# Altium PCB ESP32-C3FH4-v1.2.PcbDoc (part 1 of 2)
Units mil, origin at the board's own origin, x right, y up, seen from the top; angles counter-clockwise.
Board outline 1418.46 x 1854.93 mil, 4 copper layers (Top Layer, GND, POWER, Bottom Layer), stack 30.634 mil thick; 59 components, 45 nets, 255 pads, 118 vias.
Unrouted connection lines stored in the file: 2.
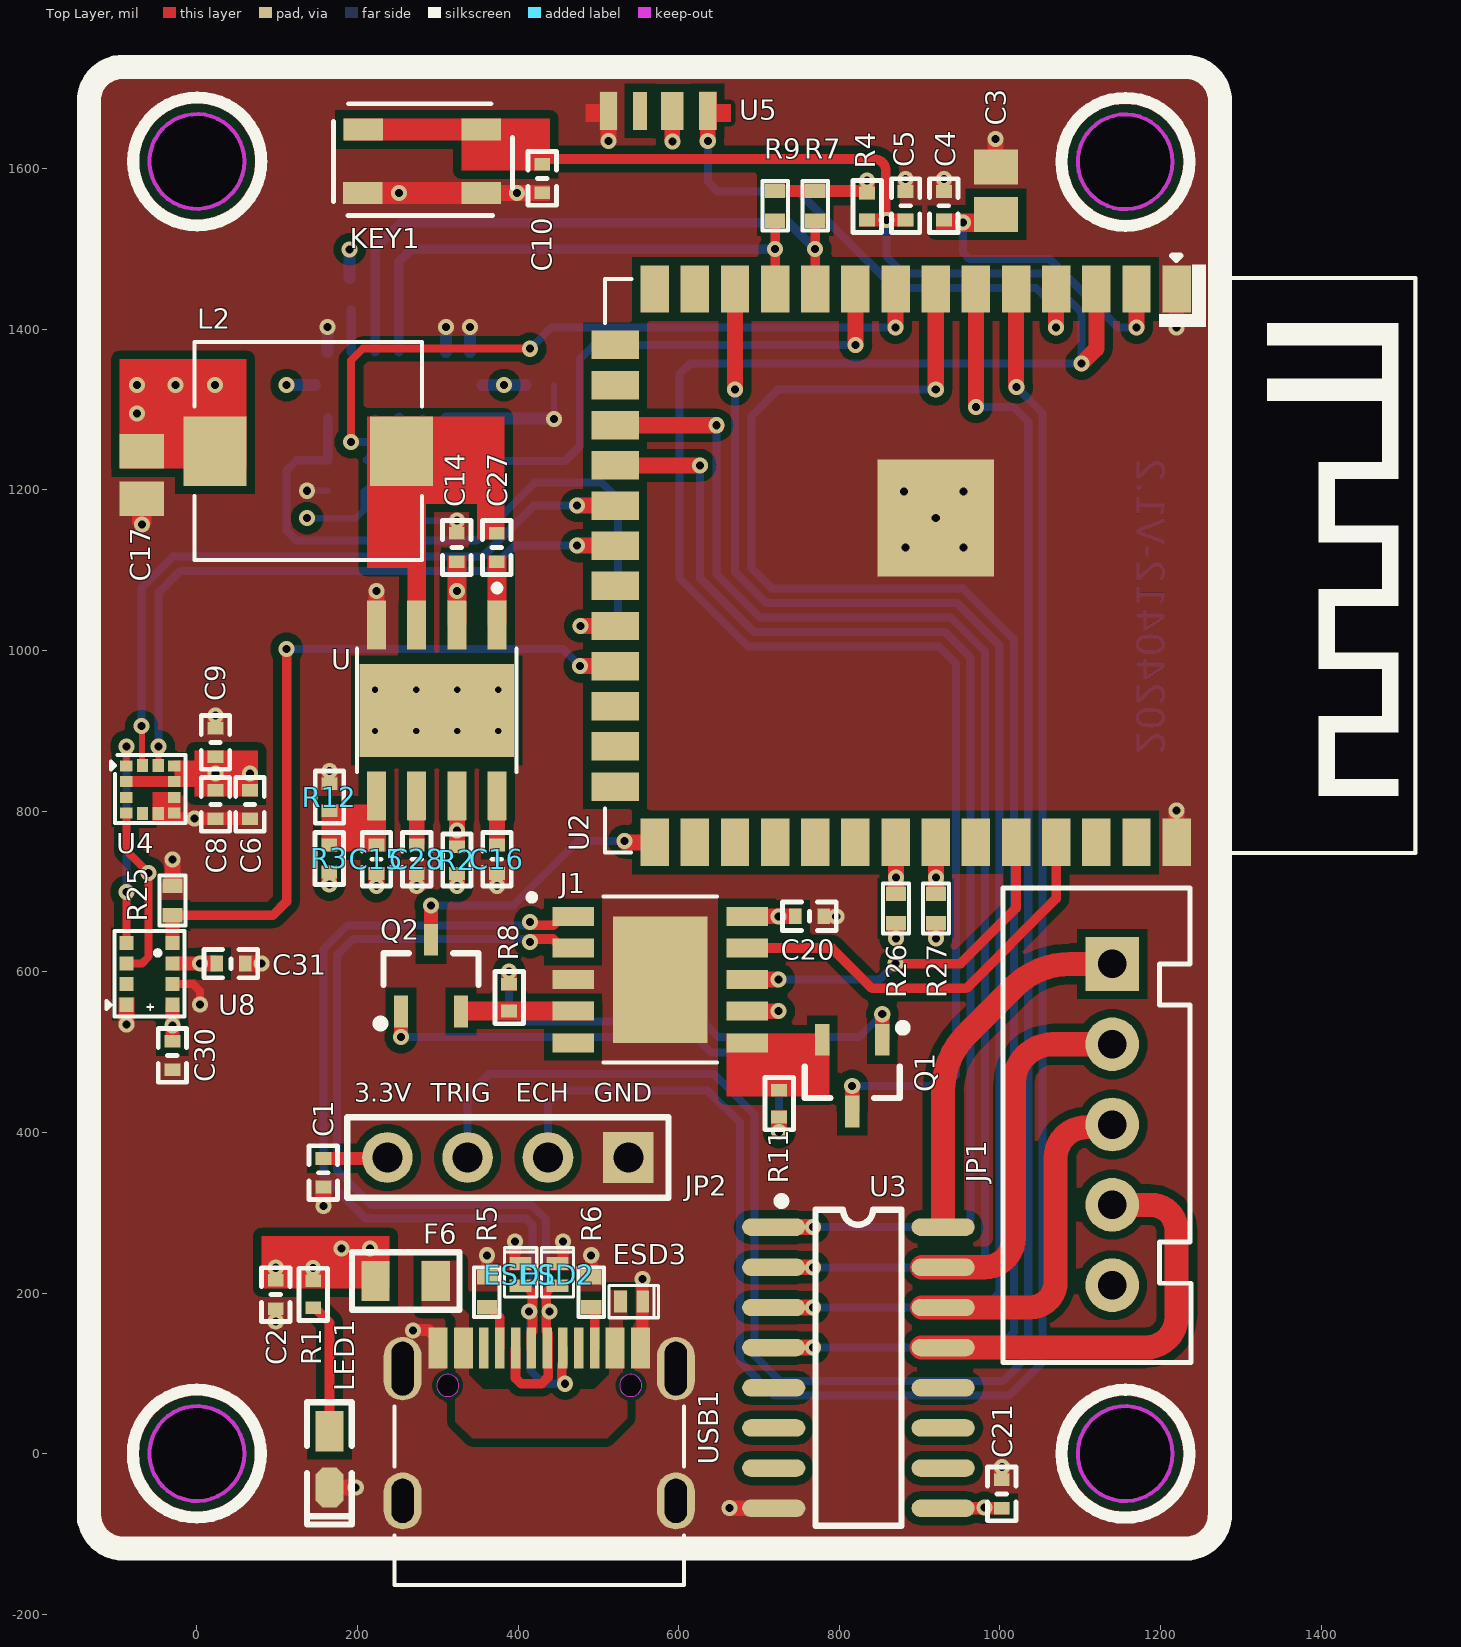
[diagram p0: Top Layer view]
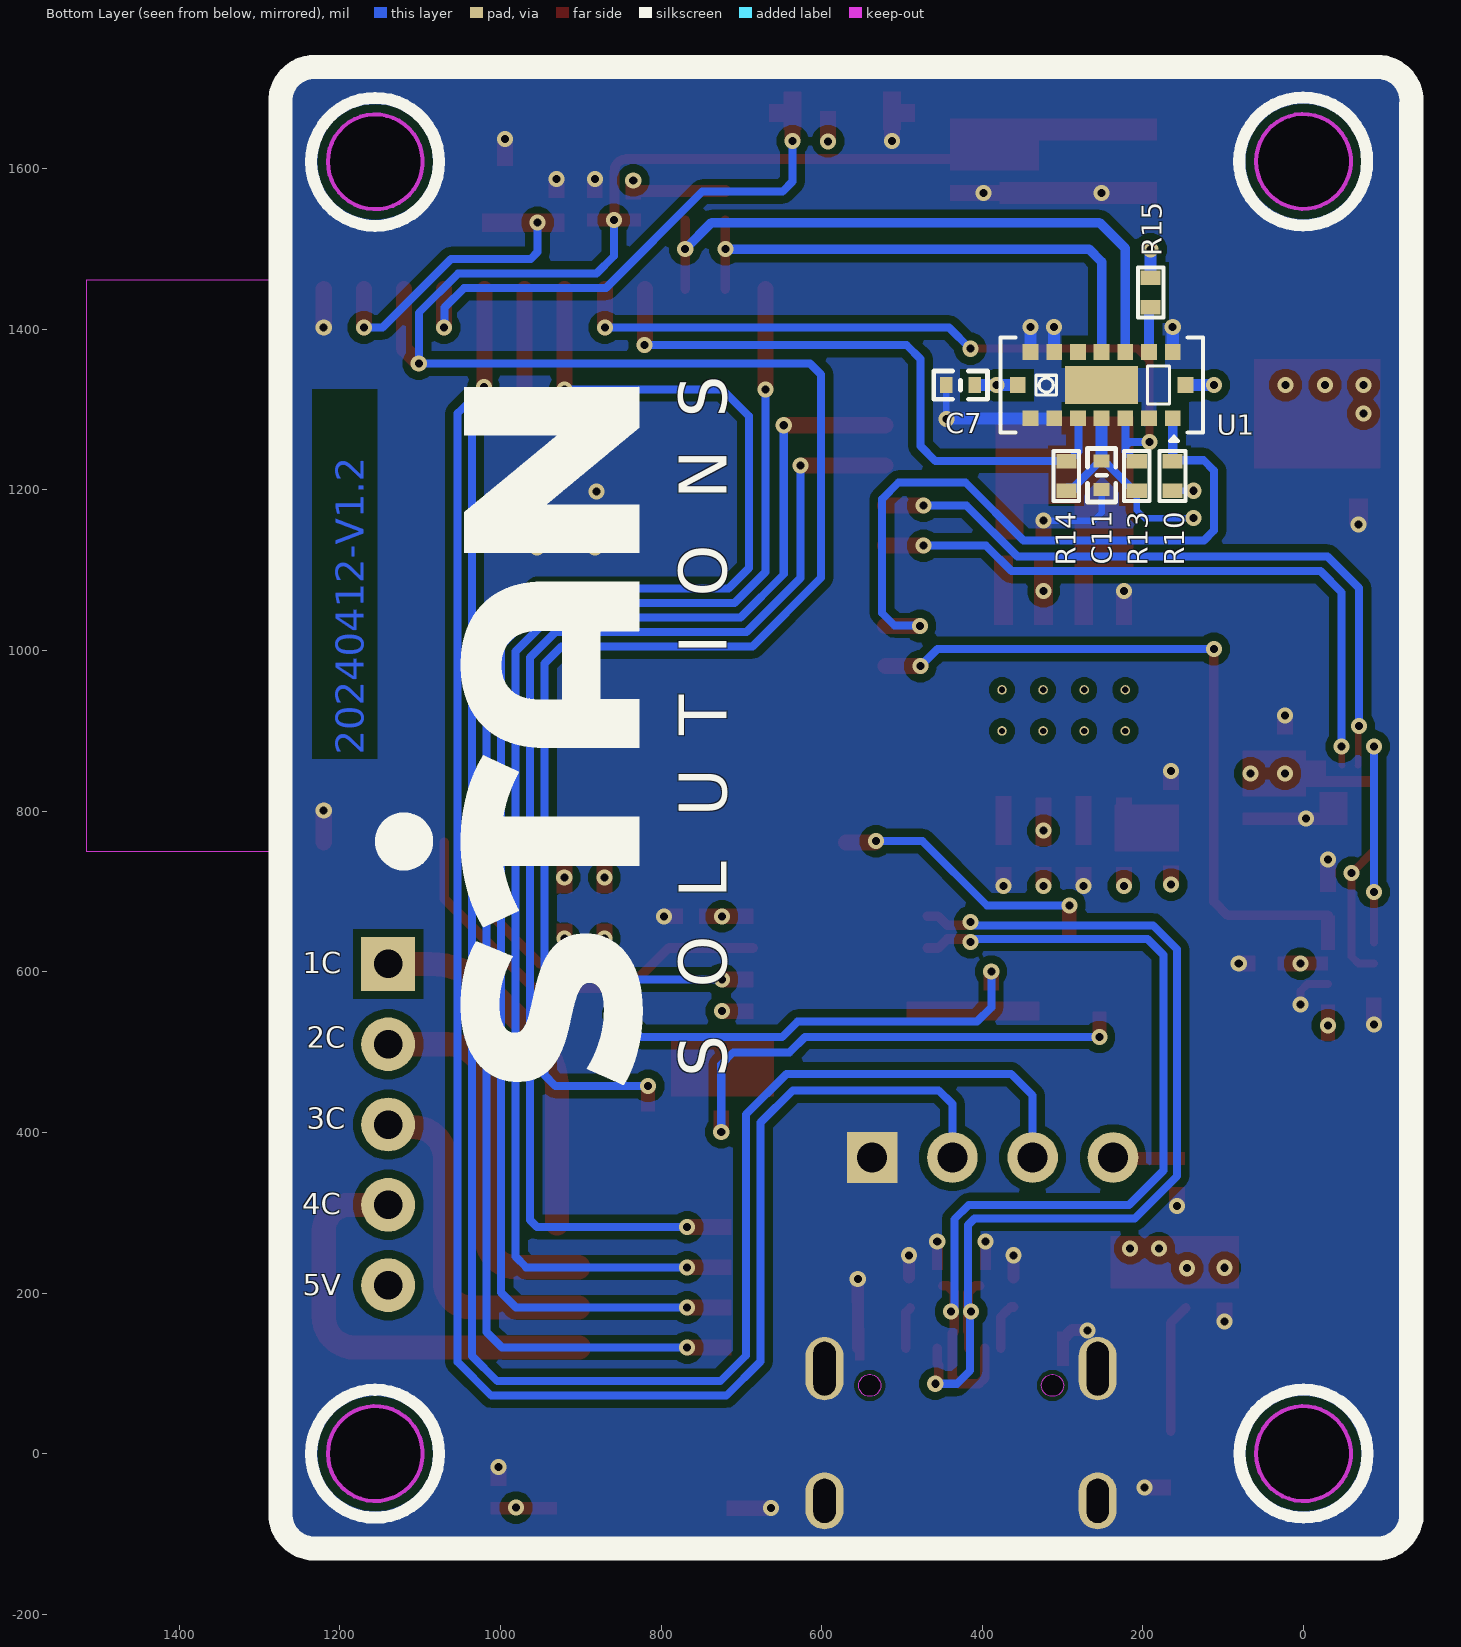
[diagram p1: Bottom Layer view, seen from below]
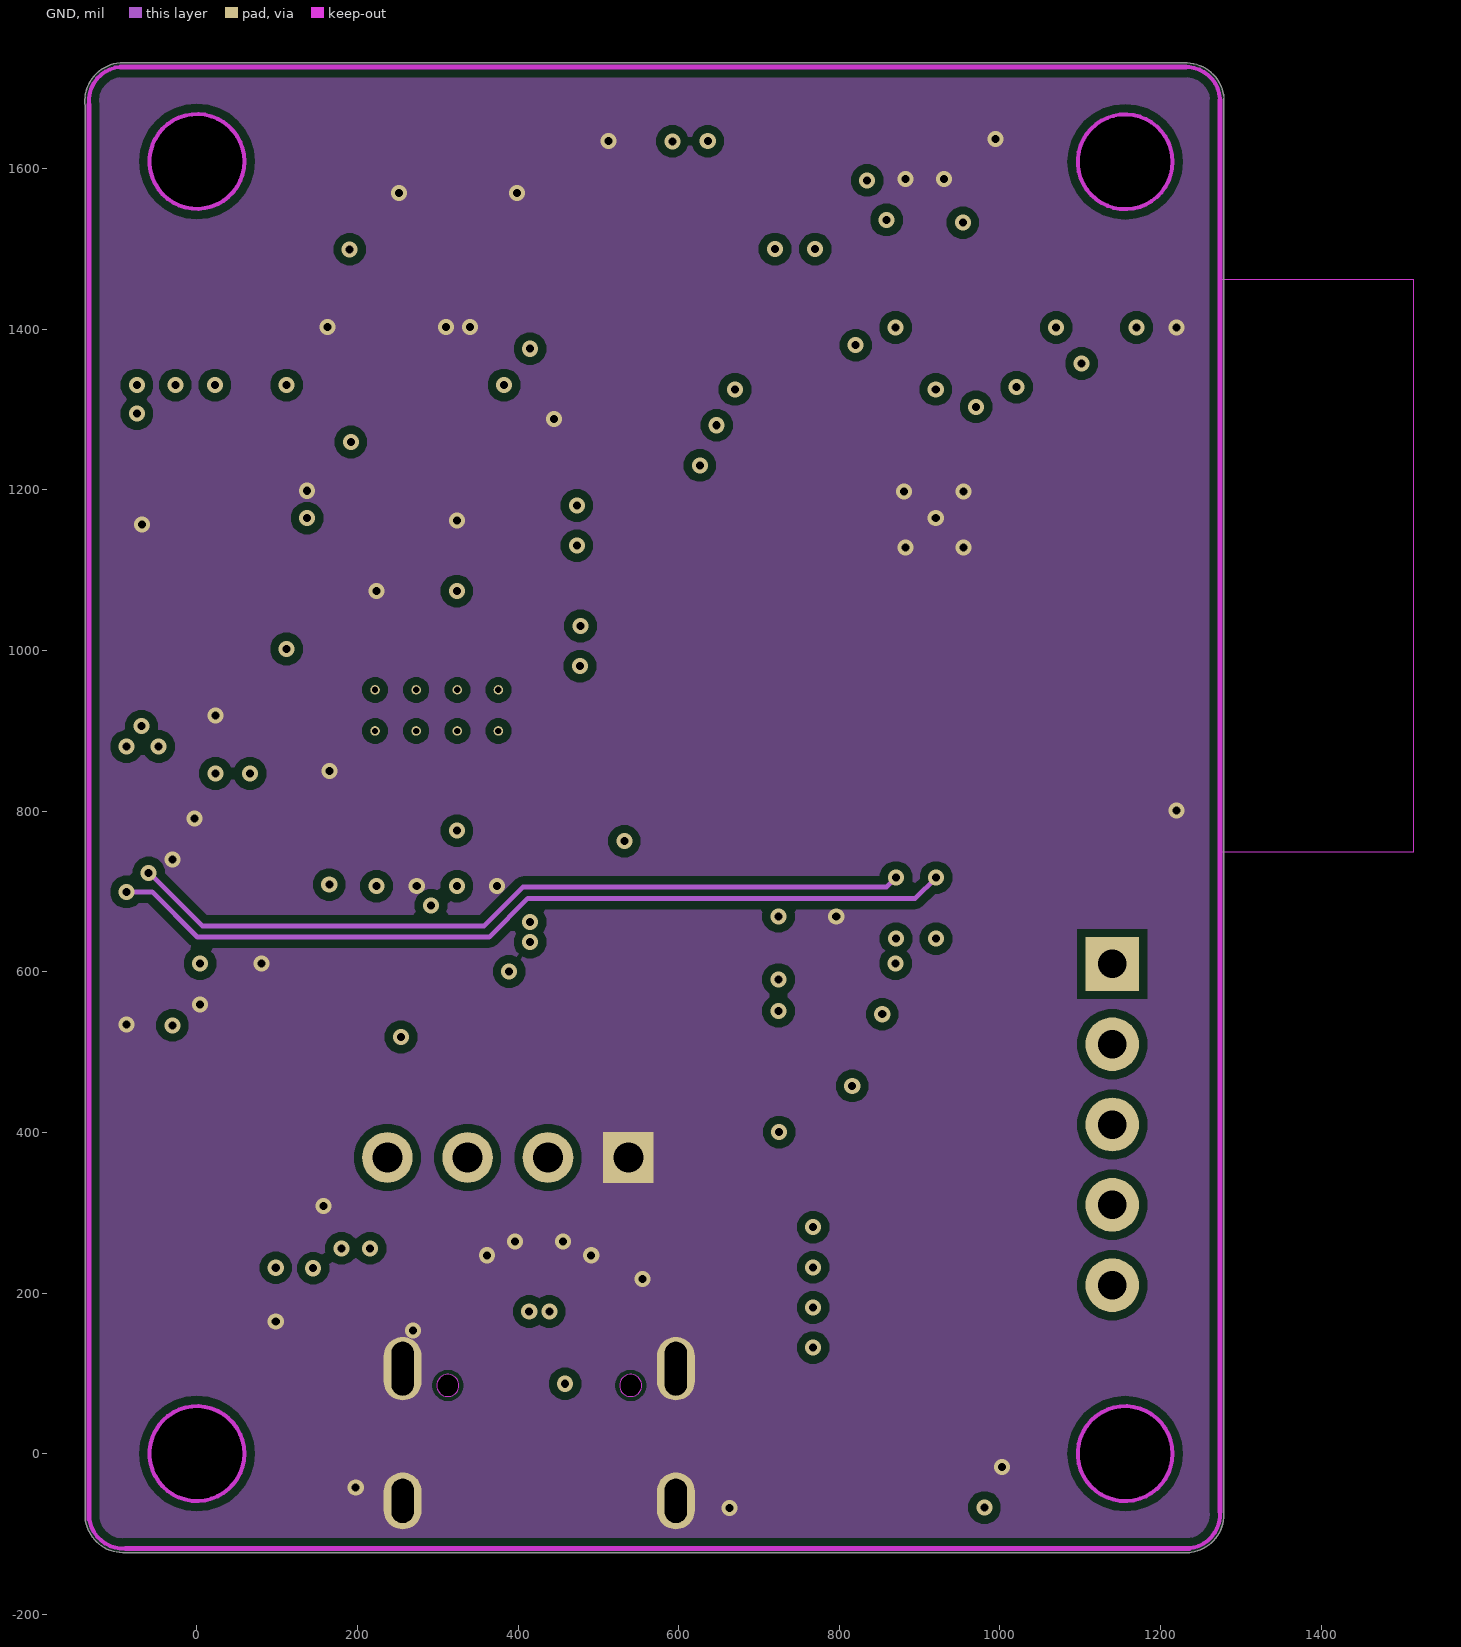
[diagram p2: GND]
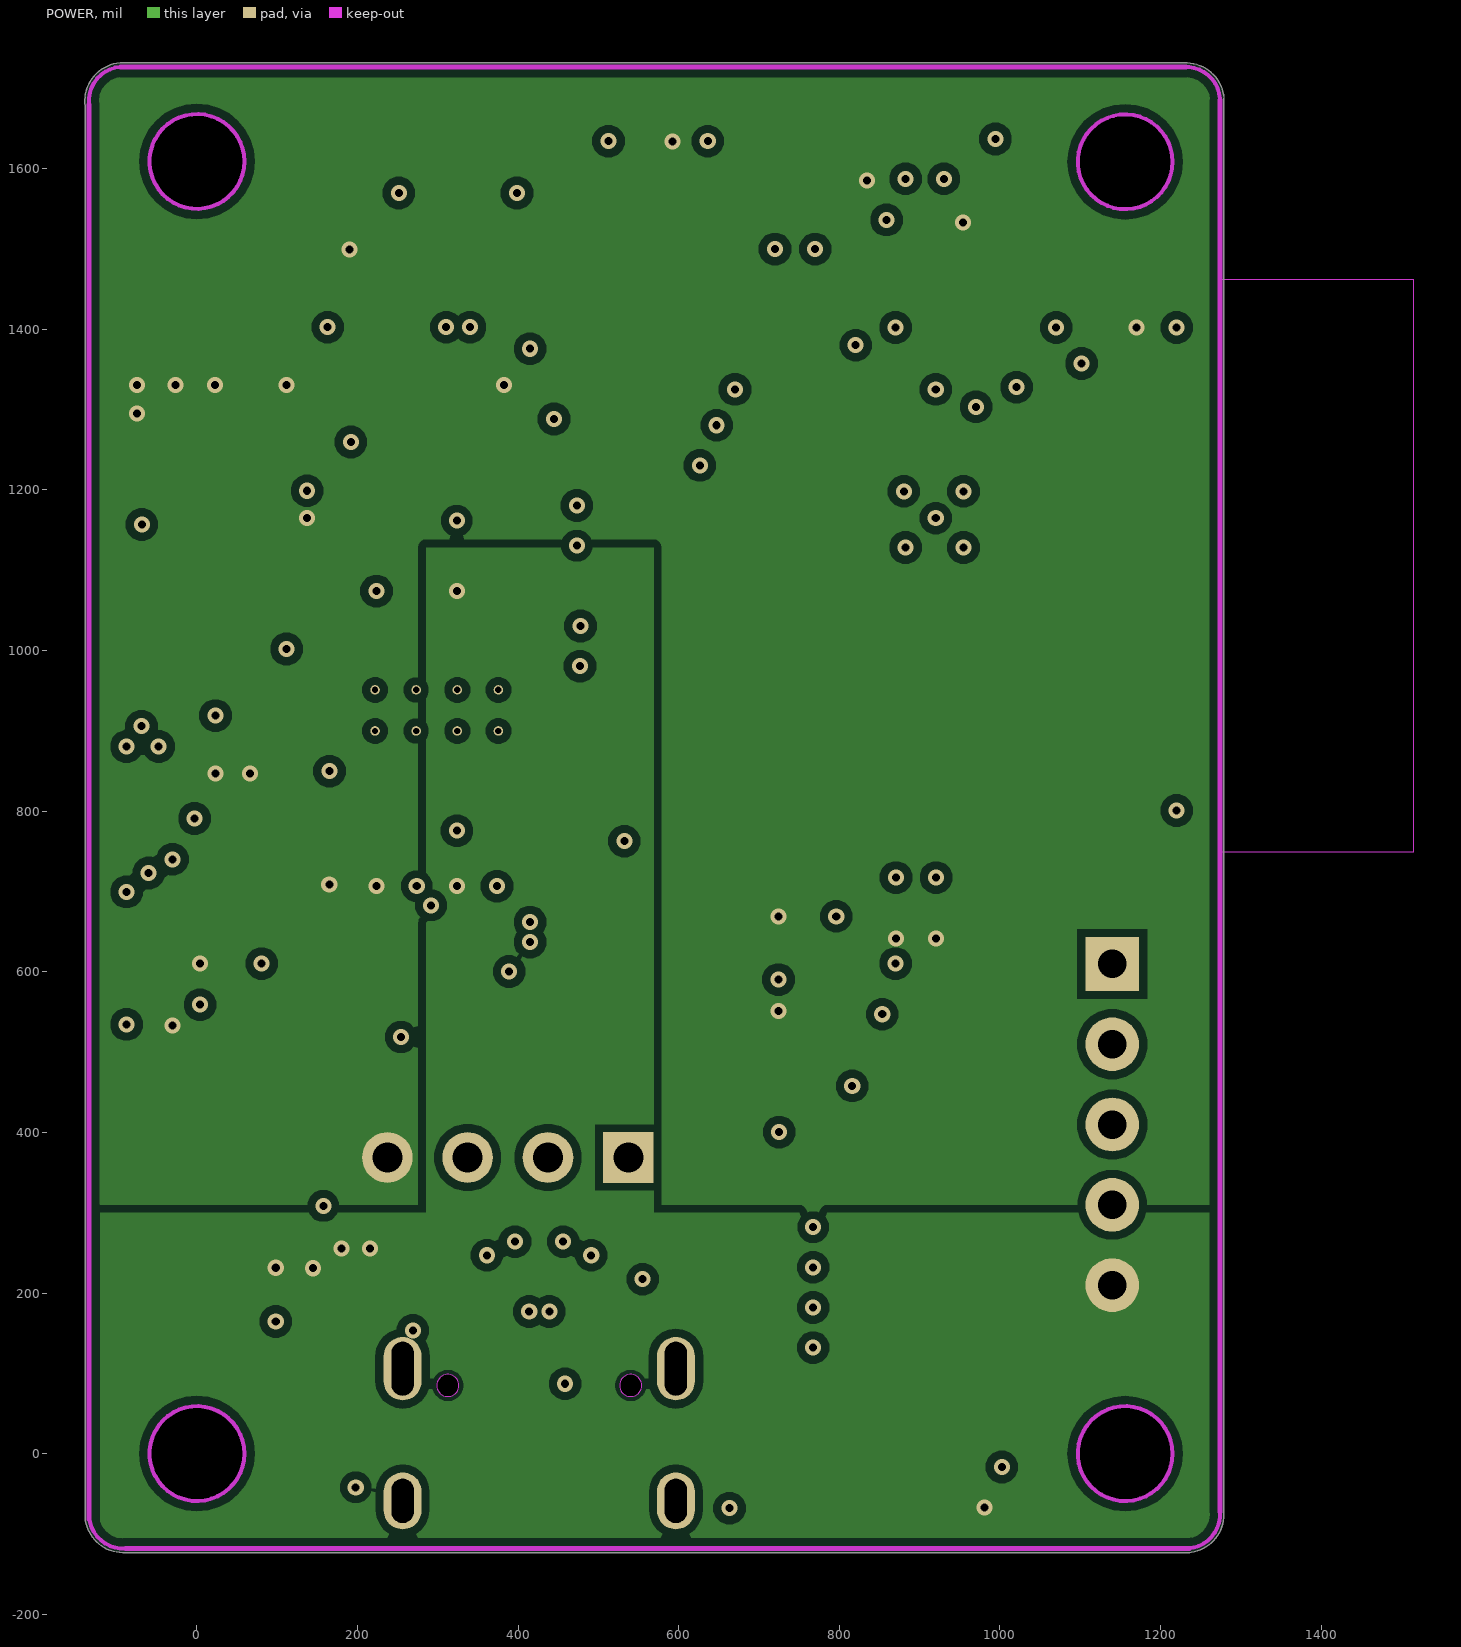
[diagram p3: POWER]
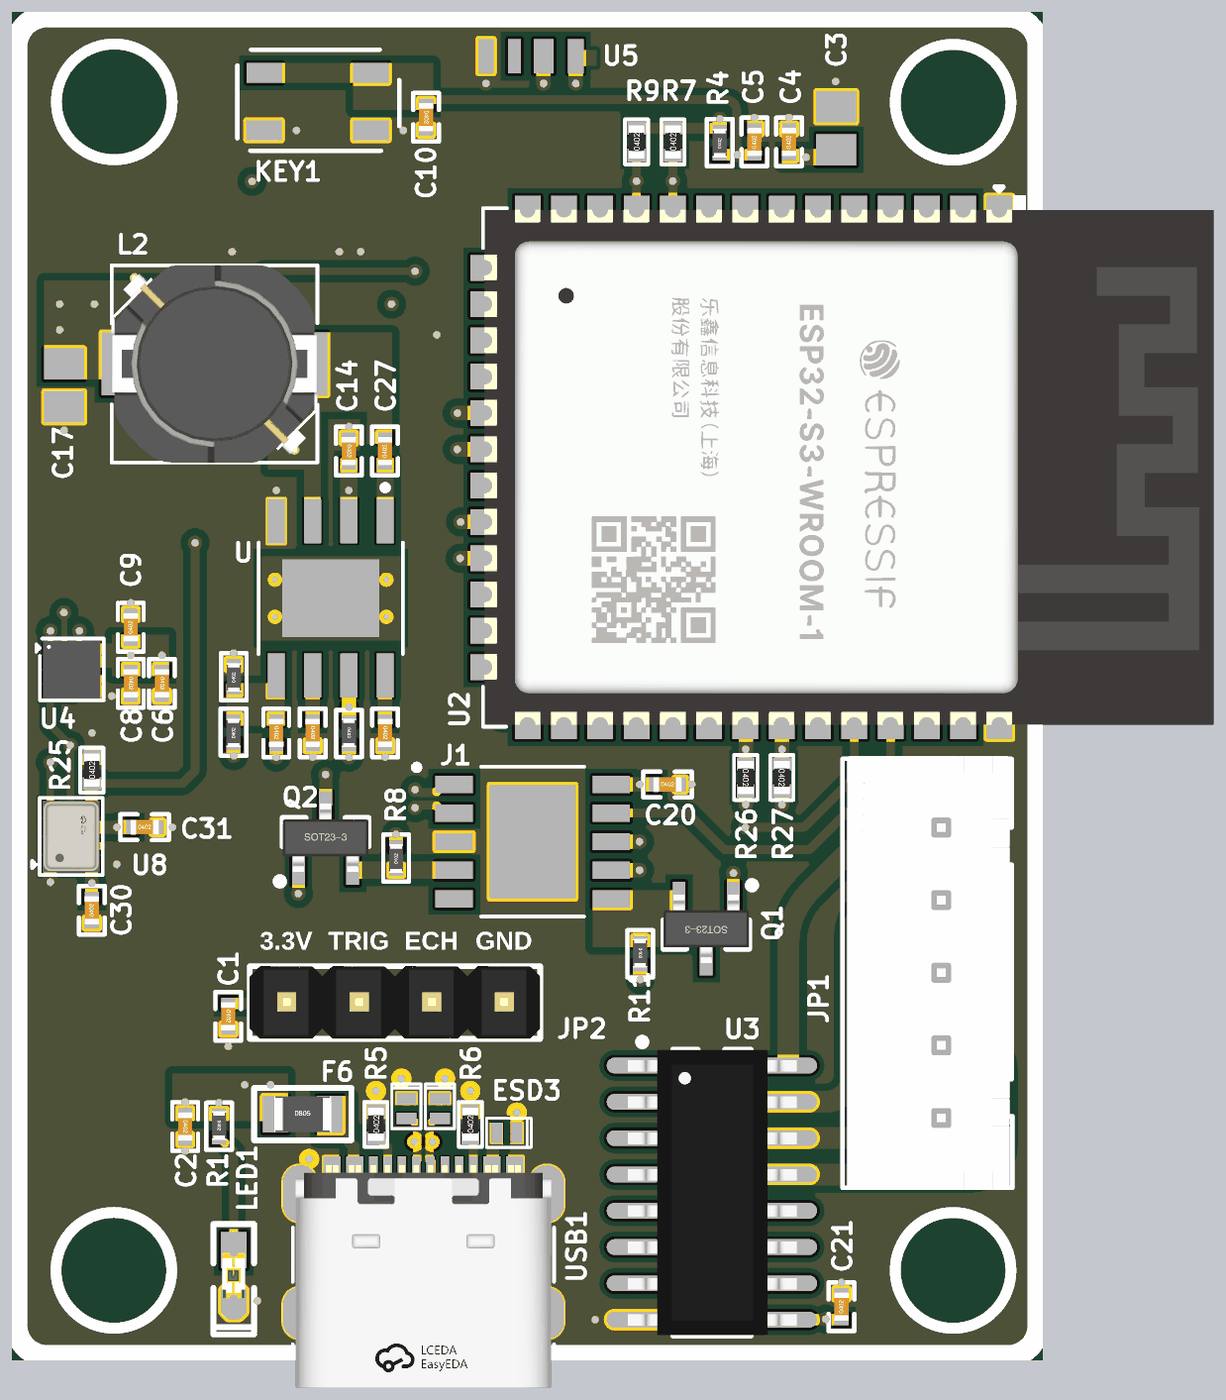
[diagram p4: 3D render of the assembled board from above, using the file's embedded part models]
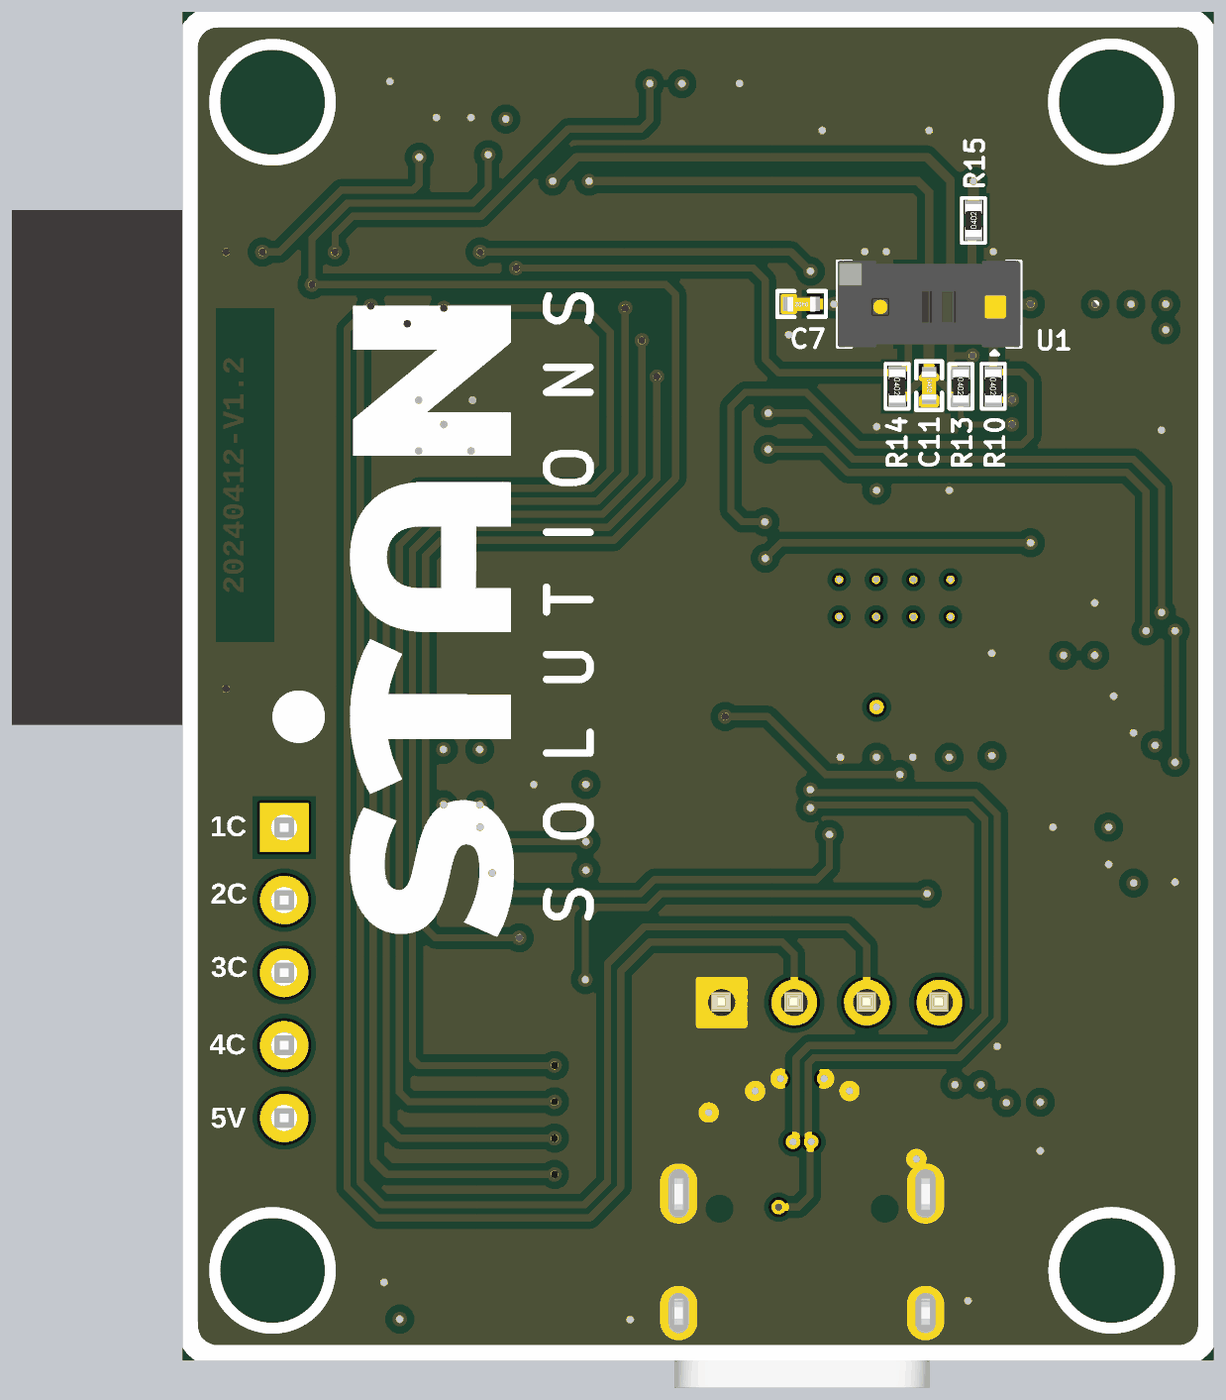
[diagram p5: 3D render of the assembled board from below, using the file's embedded part models]

## Layer stack, top to bottom
Top Solder: solder mask 0.4, Solder Resist, Dk 3.5
Top Layer: signal copper 1.4
Dielectric 1: core 10, FR-4, Dk 4.2
GND: signal copper 1.417
Dielectric 3: prepreg 5, Dk 4.2
POWER: signal copper 1.417
Dielectric 2: core 10, Dk 4.2
Bottom Layer: signal copper 1.4
Bottom Solder: solder mask 0.4, Solder Resist, Dk 3.5

## Board outline
-139.23,-83.02 -139.23,1679.18 -139.51,1681.13 cw(c-92.21,1684.49) -95.57,1731.79 -94.81,1731.79 1231.89,1731.79 1232.83,1731.7 cw(c1231.64,1684.29) 1278.94,1687.65 1278.86,1685.57 1278.86,-72.82 1278.86,-75.82 cw(c1231.44,-75.82) 1238.05,-122.78 1236.19,-123.14 -88.48,-123.14 -88.56,-123.14 cw(c-91.91,-75.84)
cut-out: 1156.2,1549.61 cw(c1156.2,1608.66) 1097.14,1608.66 cw(c1156.2,1608.66) 1156.2,1667.72 cw(c1156.2,1608.66) 1215.26,1608.66 cw(c1156.2,1608.66)
cut-out: 1156.2,-59.09 cw(c1156.2,-0.03) 1097.14,-0.03 cw(c1156.2,-0.03) 1156.2,59.02 cw(c1156.2,-0.03) 1215.26,-0.03 cw(c1156.2,-0.03)
cut-out: 0.5,1550.12 cw(c0.5,1609.17) -58.56,1609.17 cw(c0.5,1609.17) 0.5,1668.23 cw(c0.5,1609.17) 59.56,1609.17 cw(c0.5,1609.17)
cut-out: -59.06,0 ccw(c0,0) 0,-59.06 ccw(c0,0) 59.06,0 ccw(c0,0) 0,59.06 ccw(c0,0)

## Design rules (kind name [scope] priority, off if disabled: settings)
Clearance [All] p1: gap=5 ignorepadtopadclearanceinfootprint=FALSE except(10: Arc-Poly Track-Poly SMDPad-Poly THPad-Poly Via-Poly Fill-Poly Poly-Poly)
ComponentClearance [All] p1: gap=10 collisioncheckmode=3 verticalgap=10 showdistances=TRUE
DiffPairsRouting DiffPairsRouting_2 [All] p1: maxlimit=5 minlimit=5 mostfreqgap=5 toplayer_minwidth=12 toplayer_maxwidth=12 toplayer_prefwidth=12 bottomlayer_minwidth=12 bottomlayer_maxwidth=12 bottomlayer_prefwidth=12 impedanceprofiledriven=TRUE impedanceprofileid={24D7325C-6BC3-4DBD-915D-B261285324E1} impedanceprofilevalue=90.000000 maxuncoupledlength=500
HoleToHoleClearance [All] p1: gap=0 allowstackedmicrovias=TRUE
MatchedLengths USB [InNetClass('USB')] p1: tolerance=20 checknetsindiffpair=TRUE checkdiffpairvsdiffpair=FALSE checkxsignals=FALSE checkothers=FALSE
MinimumSolderMaskSliver [All] p1: minsoldermaskwidth=0
PlaneClearance [All] p1: clearance=10
PlaneConnect [All] p1: planeconnectstyle=Direct reliefexpansion=20 reliefentries=4 reliefconductorwidth=10 reliefairgap=10
PolygonConnect [All] p1: connectstyle=Direct reliefconductorwidth=10 reliefentries=4 polygonreliefangle="90 Angle" airgapwidth=10
RoutingVias [All] p1: holewidth=10 width=20 viastyle="Through Hole" minholewidth=10 minwidth=20 maxholewidth=10 maxwidth=20
SilkToSilkClearance [All] p1: silktosilkclearance=0
SilkToSolderMaskClearance [IsPad] p1: minsilkscreentomaskgap=0 clearancetoexposedcopper=TRUE
SolderMaskExpansion [All] p1: expansion=4 istentingtop=FALSE
SupplyNets "Schematic Supply Nets_2" [InNet('3.3V')] p1: voltage=0.000
SupplyNets "Schematic Supply Nets_1" [InNet('GND')] p2: voltage=0.000
SupplyNets "Schematic Supply Nets" [InNet('VIN5V')] p3: voltage=0.000
ViasUnderSMD [All] p1: allowed=FALSE
Width power [InNetClass('power')] p1: maxlimit=100 minlimit=12 preferedwidth=12
Width [All] p2: maxlimit=100 minlimit=5 preferedwidth=8 midlayer1_prefwidth=6 midlayer2_prefwidth=6 minimp=50.000000 maximp=50.000000 favimp=50.000000
22 further rules are at their usual default settings.

## Classes and differential pairs
differential pair class USB_Lines: D
net class USB: D_N D_P
differential pair D: +D_P -D_N

## Components (designator, comment, footprint, x,y, rotation, side; value= is the part's Value field where it differs from the comment)
C1 "0.1uF/25V" "C 0402_L" 157.43,349.82 r270 top
C2 "0.1uF/25V" "C 0402_L" 98.15,198.02 r270 top
C3 "22uF/25V" C0805 995.13,1572.68 r90 top
C4 "0.1uF/25V" "C 0402_L" 930.13,1553.96 r90 top
C5 "1uF/10V" "C 0402_L" 882.44,1553.96 r90 top
C6 "0.1uF/25V" "C 0402_L" 66.08,808.41 r270 top
C7 "22uF" "C 0402_L" 426.96,1330.6 r0 bottom
C8 "10uF/10V" "C 0402_L" 23.11,808.41 r270 top
C9 "0.1uF/25V" "C 0402_L" 23.1,885.59 r90 top
C10 "0.1uF/25V" "C 0402_L" 430,1588 r270 top
C11 "0.1uF" "C 0402_L" 251.37,1218.29 r270 bottom
C14 "22uF/10V" "C 0402_L" 323.6,1128.31 r270 top value=15P
C15 "10pF/10V" "C 0402_L" 223.6,740.1 r270 top value=15P
C16 "8.2nF/25V" "C 0402_L" 373.6,740.1 r270 top
C17 "22uF/25V" C0805 -68.66,1218.69 r270 top
C20 "0.1uF/25V" "C 0402_L" 762.64,669.06 r0 top
C21 "0.1uF/25V" "C 0402_L" 1002.28,-50.13 r90 top
C27 "0.1uF/10V" "C 0402_L" 373.34,1128.31 r90 top value=15P
C28 "1uF/25V" "C 0402_L" 273.74,740.1 r270 top
C30 "0.1uF/25V" "C 0402_L" -30.52,495.88 r90 top
C31 "0.1uF/25V" "C 0402_L" 42.26,610.23 r0 top
ESD1 "ESD5311N-2/TR" X1-DFN1006-2_L1.0-W0.6-RD 403,223 r270 top
ESD2 "ESD5311N-2/TR" X1-DFN1006-2_L1.0-W0.6-RD 449,223 r270 top
ESD3 "ESD5311N-2/TR" X1-DFN1006-2_L1.0-W0.6-RD 541.21,189.38 r180 top
F6 "6V1A" "R 0805_L" 260,215 r0 top
J1 "CH340K" *SOP100P600X160-11N 576.85,590.32 r0 top locked
JP1 "HDR-1X5" XH2.54-LI-5P 1139.81,409.8 r270 top
JP2 "X6511WV-04H-C60D30" HDR1X4_ 537.13,368.74 r180 top
KEY1 "6*6*5" "TSW SMD-6*6*5" 380,1658.94 r180 top
L2 "CLF7045T-3R3N-D" IND_CLF7045T-3R3N-D 138.52,1248.31 r0 top locked value=0R1%
LED1 "GREEN" "LED 0603B" 164.79,-7.22 r270 top locked
Q1 "S8050" SOT23-3L 816,470.29 r180 top
Q2 "S8050" SOT23-3L 291.47,595.62 r0 top
R1 "1K" "R 0402_L" 144.8,199.36 r270 top locked
R2 "10K" "R 0402_L" 323.76,740.1 r270 top
R3 "84.5K" "R 0402_L" 164.79,740.1 r90 top
R4 "10K" "R 0402_L" 834.56,1552 r90 top
R5 "5.1K" Res-0402 361,201 r90 top locked
R6 "5.1K" Res-0402 491,201 r90 top locked
R7 "2.2K" Res-0402 770,1553.96 r90 top
R8 "10K" "R 0402_L" 388.75,566.88 r90 top
R9 "2.2K" Res-0402 720,1553.96 r90 top
R10 "47K" Res-0402 163,1217.5 r270 bottom
R11 "10K" "R 0402_L" 725,436.84 r270 top
R12 "25.5K" "R 0402_L" 165.05,816.41 r90 top
R13 "47K" Res-0402 207.6,1217.5 r270 bottom
R14 "47K" Res-0402 295.25,1217.5 r270 bottom
R15 "47K" Res-0402 190.24,1445.75 r90 bottom
R25 "100K" Res-0402 -30.52,688.81 r90 top
R26 "2.2K" Res-0402 870.46,678.7 r270 top
R27 "2.2K" Res-0402 920.29,678.7 r270 top
U "TPS54339DDA" VREG_LM5017MR/NOPB 298.6,925.5 r270 top locked
U1 "VL53L5CXV0GC/1" VL53L5CXV0GC/1 251.36,1330.59 r180 bottom
U2 "ESP32-S3-WROOM-1-N4R2" "41-SMD Module" 870.39,1105.79 r270 top locked
U3 "ULN2003" SOP16 823.27,107.03 r0 top locked
U4 "LIS2DW12TR" "12-LGA (2x2)" -58,827 r0 top
U5 "SK6812 SIDE-A" "SK6812 SIDE-A" 741.11,1705.63 r180 top locked
U8 "SPL06-001" SPL06-001 -59.06,597.44 r180 top
USB1 "KH-TYPE-C-16P" KH-TYPE-C-16P 426.29,36.28 r0 top locked

## Footprints (in the part's own frame and the unit in brackets; to place one, negate y for a bottom-side part, rotate by r counter-clockwise, add the part's x,y. Pads: shape width x height; smd on the part's side, far side on the other; paste and mask are expansions set on the pad)
"12-LGA (2x2)" [mm]
  rect 0.4x0.35 smd: 1(-0.76,0.75) 2(-0.76,0.25) 3(-0.76,-0.25) 4(-0.76,-0.75) 7(0.76,-0.75) 8(0.76,-0.25) 9(0.76,0.25) 10(0.76,0.75)
  rect 0.35x0.4 smd: 5(-0.25,-0.76) 6(0.25,-0.76) 11(0.25,0.76) 12(-0.25,0.76)
  silkscreen extent -1.24,-1.07 1.12,1.09, body extent -1,-1 1,1, height 0.7
"41-SMD Module" [mm]
  rect 1.5x0.9 smd: 1(-8.75,8.88) 2(-8.75,7.61) 3(-8.75,6.34) 4(-8.75,5.07) 5(-8.75,3.8) 6(-8.75,2.53) 7(-8.75,1.26) 8(-8.75,-0.01) 9(-8.75,-1.28) 10(-8.75,-2.55) 11(-8.75,-3.82) 12(-8.75,-5.09) 13(-8.75,-6.36) 14(-8.75,-7.63) 27(8.75,-7.63) 28(8.75,-6.36) 29(8.75,-5.09) 30(8.75,-3.82) 31(8.75,-2.55) 32(8.75,-1.28) 33(8.75,-0.01) 34(8.75,1.26) 35(8.75,2.53) 36(8.75,3.8) 37(8.75,5.07) 38(8.75,6.34) 39(8.75,7.61) 40(8.75,8.88)
  rect 0.9x1.5 smd: 15(-6.98,-8.88) 16(-5.71,-8.88) 17(-4.44,-8.88) 18(-3.17,-8.88) 19(-1.9,-8.88) 20(-0.63,-8.88) 21(0.64,-8.88) 22(1.91,-8.88) 23(3.18,-8.88) 24(4.45,-8.88) 25(5.72,-8.88) 26(6.99,-8.88)
  rect 3.7x3.7 smd: 41(-1.5,1.26)
  Keep-Out Layer region: -9.042,10.286 9.042,10.286 9.042,16.382 -9.042,16.382
  silkscreen extent -9.8,-9.2 9.09,16.43, body extent -9.01,-9.14 9.01,16.37, height 3.16
*SOP100P600X160-11N [mm]
  rect 1.31x0.6 smd: 1(-2.75,2) 2(-2.75,1) 3(-2.75,0) 4(-2.75,-1) 5(-2.75,-2) 6(2.75,-2) 7(2.75,-1) 8(2.75,0) 9(2.75,1) 10(2.75,2)
  rect 3x4 smd: 11(0,0)
  silkscreen extent -4.16,-2.62 1.8,2.7
C0805 [mm] "Chip Capacitor, Body 2.0x1.3mm, IPC High Density"
  rect 1.1x1.4 smd: 1(-0.75,0) 2(0.75,0)
  body extent -1.1,-0.72 1.1,0.72, height 1.4
"C 0402_L" [mm] "For ANTON PCB"
  rect 0.4x0.5 smd: 1(-0.45,0) 2(0.45,0)
  silkscreen extent -0.85,-0.45 0.85,0.45, body extent -0.5,-0.26 0.5,0.26, height 0.53
HDR1X4_ [mm] "Connector; Header; 4 Position"
  rect 1.6x1.6 hole 0.95: 1(0,0)
  round 1.6 hole 0.95: 2(2.54,0) 3(5.08,0) 4(7.62,0)
  silkscreen extent -1.27,-1.27 8.89,1.27, body extent -1.27,-1.27 8.89,1.27, height 9.5
IND_CLF7045T-3R3N-D [mm]
  rect 2x2.2 smd: 1(-2.95,0) 2(2.95,0)
  silkscreen extent -3.6,-3.45 3.6,3.45, body extent -3.6,-3.45 3.6,3.45, height 4.8
KH-TYPE-C-16P [mm]
  oval 1.2x2 hole 0.7 slot 1.7 at 90 deg paste-2539.97 mask+0.051: 1(-4.32,1.765) 2(4.32,1.765)
  oval 1.2x1.8 hole 0.7 slot 1.4 at 90 deg paste-2539.97 mask+0.051: 3(-4.32,-2.415) 4(4.32,-2.415)
  rect 0.3x1.3 smd paste-100 mask+0.05: A1(-3.35,2.415) A4(-2.55,2.415) A5(-1.25,2.415) A6(-0.25,2.415) A7(0.25,2.415) A8(1.25,2.415) A9(2.55,2.415) A12(3.35,2.415) B1(3.05,2.415) B4(2.25,2.415) B5(1.75,2.415) B6(0.75,2.415) B7(-0.75,2.415) B8(-1.75,2.415) B9(-2.25,2.415) B12(-3.05,2.415)
  Keep-Out Layer board cut-out: -2.54,1.235 -2.575,1.387 -2.672,1.509 -2.812,1.576 -2.968,1.576 -3.108,1.509 -3.206,1.387 -3.24,1.235 -3.24,1.235 -3.205,1.083 -3.108,0.961 -2.968,0.894 -2.812,0.894 -2.672,0.961 -2.575,1.083 -2.54,1.235
  Keep-Out Layer board cut-out: 3.24,1.235 3.205,1.387 3.108,1.509 2.968,1.576 2.812,1.576 2.672,1.509 2.574,1.387 2.54,1.235 2.54,1.235 2.575,1.083 2.672,0.961 2.812,0.894 2.968,0.894 3.108,0.961 3.205,1.083 3.24,1.235
  silkscreen extent -4.57,-5.08 4.57,0.57, body extent -4.47,-5.05 4.47,2.76, height 3.25
"LED 0603B" [mil] "À¶É«0603LED"
  rect 50x35 smd: 1(-35,0.26)
  oct 50x35 smd: 2(35,0.26)
  silkscreen extent -71,-28 81,28, body extent -31,-16 32,16, height 24
"R 0402_L" [mm] "1/16WÌùÆ¬µç×è"
  rect 0.4x0.5 smd: 1(-0.4,0) 2(0.45,0)
  silkscreen extent -0.8,-0.45 0.85,0.45, body extent -0.5,-0.25 0.5,0.25, height 0.3
"R 0805_L" [mil] "1/8WÌùÆ¬µç×è"
  rect 35x50 smd: 1(-37.4,0) 2(37.4,0)
  silkscreen extent -67,-36 67,36, body extent -39,-25 39,25, height 20
Res-0402 [mil]
  rect 18x25 smd mask+2.17: 1(-18.5,0) 2(18.5,0)
  silkscreen extent -32,-17 32,16, body extent -23,-11 23,11, height 16
"SK6812 SIDE-A" [mm]
  rect 0.55x1.2 smd: 1(2.667,0.855) 4(5.806,0.853)
  rect 0.7x1.2 smd: 2(3.789,0.858)
  rect 0.45x1.2 smd: 3(4.809,0.853)
  Top Layer region: 2.938,0.255 2.387,0.255 2.387,0.64 1.935,0.64 1.935,1.201 2.388,1.201 2.388,1.453 2.936,1.453
  Top Layer region: 5.53,1.452 6.081,1.452 6.081,1.204 6.533,1.204 6.533,0.647 6.08,0.647 6.08,0.254 5.532,0.254
SOP16 [mm] "£¨ËâÃ×¹¤·»£©"
  oval 2x0.55 smd: 1(-2.667,4.445) 2(-2.667,3.175) 3(-2.667,1.905) 4(-2.667,0.635) 5(-2.667,-0.635) 6(-2.667,-1.905) 7(-2.667,-3.175) 8(-2.667,-4.445) 9(2.692,-4.445) 10(2.692,-3.175) 11(2.692,-1.905) 12(2.692,-0.635) 13(2.692,0.635) 14(2.692,1.905) 15(2.692,3.175) 16(2.692,4.445)
  silkscreen extent -2.55,-5 1.37,5.39, body extent -2.92,-4.99 2.98,4.99, height 1.45
SOT23-3L [mm] "3x1.3x1mm(³¤¿í¸ß)"
  rect 0.45x1 smd: 1(-0.95,-1.143) 2(0.95,-1.143) 3(0,1.125)
  silkscreen extent -1.73,-1.65 1.5,0.7, body extent -1.5,-1.2 1.5,1.2, height 1.05
SPL06-001 [mm]
  rect 0.45x0.45 smd: 1(0.725,0.975) 2(0.725,0.325) 3(0.725,-0.325) 4(0.725,-0.975) 5(-0.725,-0.975) 6(-0.725,-0.325) 7(-0.725,0.325) 8(-0.725,0.975)
  silkscreen extent -1.1,-1.35 1.36,1.35, body extent -1,-1.25 1,1.25, height 0.96
"TSW SMD-6*6*5" [mm] "6*6*5mm"
  rect 1.25x0.7 smd: 1(0.66,2.261) 2(0.66,0.254) 3(4.394,0.254) 4(4.4,2.261)
  silkscreen extent -0.33,-0.56 5.33,2.97
VL53L5CXV0GC/1 [mm]
  rect 0.5x0.5 smd paste+0 mask+0.05: A1(2.25,-1.05) A2(1.5,-1.05) A3(0.75,-1.05) A4(0,-1.05) A5(-0.75,-1.05) A6(-1.5,-1.05) A7(-2.25,-1.05) B1(2.65,0) B7(-2.65,0) C1(2.25,1.05) C2(1.5,1.05) C3(0.75,1.05) C4(0,1.05) C5(-0.75,1.05) C6(-1.5,1.05) C7(-2.25,1.05)
  rect 2.316x1.2 smd paste+0 mask+0.05: B4(0,0)
  silkscreen extent -3.2,-1.76 3.2,1.5, body extent -3.2,-1.51 3.2,1.52, height 1.5
VREG_LM5017MR/NOPB [mm]
  rrect5% 1.55x0.6 smd mask+0: 1(-2.7,1.905) 2(-2.7,0.635) 3(-2.7,-0.635) 4(-2.7,-1.905) 5(2.7,-1.905) 6(2.7,-0.635) 7(2.7,0.635) 8(2.7,1.905)
  rect 2.95x4.9 smd paste-3 mask+0: 9(0,0)
  round 0.3 hole 0.2: 10(-0.65,1.95) 11(0.65,1.95) 12(-0.65,0.65) 13(0.65,0.65) 14(-0.65,-0.65) 15(0.65,-0.65) 16(-0.65,-1.95) 17(0.65,-1.95)
  silkscreen extent -3.97,-2.52 1.95,2.52
X1-DFN1006-2_L1.0-W0.6-RD [mm]
  rect 0.4x0.7 smd paste+0 mask+0.051: 1(-0.35,0) 2(0.35,0)
  silkscreen extent -0.85,-0.51 0.71,0.51
XH2.54-LI-5P [mm] "½Ó²å¼þ£¬5P"
  rect 1.7x1.7 hole 0.9: 1(-5.08,0)
  round 1.7 hole 0.9: 2(-2.54,0) 3(0,0) 4(2.54,0) 5(5.08,0)
  silkscreen extent -7.48,-3.45 7.52,2.49, body extent -7.58,-3.3 7.58,2.4, height 7.03

## Part data
C1 C2 C3 C4 C5 C6 C7 C8 C9 C11 C16 C17 C20 C21 C28: library part C
C10 C30 C31: library part Capacitor
C14 C15 C27: library part Cap, "Capacitor", Manufacturer="Generic Components", Class=Passive, Published=08/06/2000, Publisher="Altium Hobart Technology Centre", SubClass=Capacitor
ESD1 ESD2 ESD3: library part tvs管
F6: library part JK-SMD0603-100L, JLCPCB Part Class="Extended Part", Manufacturer="Jinrui Electronic Materials Co.", Add into BOM=yes, Convert to PCB=yes, Device=JK-SMD0603-100L, Manufacturer Part=JK-SMD0603-100L, Name=6V1.5A, Origin Footprint=F0603, Supplier=LCSC, Supplier Part=C516069, Symbol=6V1A
J1: "USB to Serial Port Chip", Package=Package, Check_prices=https://www.snapeda.com/parts/CH340K/WCH/view-part/?ref=eda, MF=WCH, MP=CH340K, SnapEDA_Link=https://www.snapeda.com/parts/CH340K/WCH/view-part/?ref=snap
JP1: library part "Header 5", "5P接插件", BOM名称=5P接插件, 学习资源=www.ooocke.com, 版权归属=源创客
JP2: "Gold 250V 3A Straight Square Pins 2.5mm 4P 260℃ 6mm -40℃~+105℃ 3mm 2.54mm Plugin Black Brass 1x4P Plugin,P=2.54mm Pin Headers ROHS", LCSC Part Number=C706876, Manufacturer=XKB, Package=Plugin,P=2.54mm, ComponentLink1Description=LCSC, ComponentLink1URL=https://www.lcsc.com/product-detail/Pin-Headers_XKB-Connectivity-X6511WV-04H-C60D30_C706876.html, Item Type="Male Header", Manufacturer Part Number=X6511WV-04H-C60D30
KEY1: library part "TSW DIP-6x6", "直插6x6轻触开关", BOM名称=直插6x6轻触开关, 学习资源=www.ooocke.com, 版权归属=源创客
L2: library part L, Code_IEC=1005, Code_JEITA=0402, LatestRevisionDate=29-May-2009, LatestRevisionNote="IPC-7351 Footprint Added.", PackageDescription="Chip Inductor", PackageReference=0402-A, Published=8-Jun-2000, Publisher="Altium Limited"
LED1: library part LED-SH-5MM, "5mm草帽LED", BOM名称=5mm草帽LED, 学习资源=www.ooocke.com, 版权归属=源创客
Q1 Q2: Manufacturer=WPMtek(维攀微), Add into BOM=yes, Convert to PCB=yes, Device=S8050, Manufacturer Part=S8050, Name=S8050, Origin Footprint=SOT-23-3_L2.9-W1.3-P1.90-LS2.4-BR, Supplier=LCSC, Supplier Part=C2688231, Symbol=S8050
R1 R2 R3 R4 R8 R11 R12: library part Res
R5 R6: library part RC0402FR-075K1L, "RES 5.1K OHM 1% 1/16W 0402", Case Code (Imperial)=0402, Case Code (Metric)=1005, LCSC Part Number=C105872, Manufacturer=Yageo, Max Operating Temperature=155°C, Max Power Dissipation=63mW, Min Operating Temperature=-55°C, Package Quantity=1, Resistance=5.1kR, Resistance Tolerance=1%, Resistor Type="Thick Film", Temperature Coefficient=100ppm/°C, Voltage Rating=50V, Case/Package=0402, Category="Chip SMD Resistors", ComponentLink1Description=https://datasheet.ciiva.com/7983/1018594-7983519.pdf?src-supplier=Element14, ComponentLink1URL=https://datasheet.ciiva.com/7983/1018594-7983519.pdf?src-supplier=Element14, ComponentLink2Description=https://datasheet.ciiva.com/46394/1018594-46394936.pdf?src-supplier=Element14, ComponentLink2URL=https://datasheet.ciiva.com/46394/1018594-46394936.pdf?src-supplier=Element14, ComponentLink3Description=https://datasheet.ciiva.com/2453/pyu-r-int-thick-7-2453401.pdf?src-supplier=Digi-Key, ComponentLink3URL=https://datasheet.ciiva.com/2453/pyu-r-int-thick-7-2453401.pdf?src-supplier=Digi-Key, ComponentLink4Description=https://datasheet.ciiva.com/2453/pyu-r-int-thick-7-2453402.pdf?src-supplier=Digi-Key, ComponentLink4URL=https://datasheet.ciiva.com/2453/pyu-r-int-thick-7-2453402.pdf?src-supplier=Digi-Key, ComponentLink5Description=https://datasheet.ciiva.com/2453/pyu-r-int-thick-7-2453400.pdf?src-supplier=Digi-Key, ComponentLink5URL=https://datasheet.ciiva.com/2453/pyu-r-int-thick-7-2453400.pdf?src-supplier=Digi-Key, ComponentLink6Description=https://datasheet.ciiva.com/12558/pyu-rc0402-51-rohs-l-6-r-8721-12558460.pdf?src-supplier=Mouser, ComponentLink6URL=https://datasheet.ciiva.com/12558/pyu-rc0402-51-rohs-l-6-r-8721-12558460.pdf?src-supplier=Mouser, ComponentLink7Description=https://datasheet.ciiva.com/16744/pyu-rc0402-51-rohs-l-6-r-16744283.pdf?src-supplier=Future+Electronics, ComponentLink7URL=https://datasheet.ciiva.com/16744/pyu-rc0402-51-rohs-l-6-r-16744283.pdf?src-supplier=Future+Electronics, ComponentLink8Description=https://datasheet.ciiva.com/15189/getdatasheetpartid-323636-15189493.pdf?src-supplier=Verical, ComponentLink8URL=https://datasheet.ciiva.com/15189/getdatasheetpartid-323636-15189493.pdf?src-supplier=Verical, Construction=Rectangular, Depth=0.5mm, Features="Moisture Resistant", Height=0.016inch, Item Type=Resistor, Lead Free="Lead Free", Length=1mm, Manufacturer Part Number=RC0402FR-075K1L, Military Standard=Not, Number of Terminations=2, Packaging="Tape and Reel", Power Rating=63mW, Pricing 1="10000=0.00085 (USD)", RoHS=Yes, RoHS Compliant=Yes, Series=RC, Stock 1=65000, Supplier 1=Avnet, Supplier Part Number 1=RC0402FR-075K1L, Technology="THICK FILM", Termination=SMD/SMT, Tolerance=1%, Voltage Rating (DC)=50V, Width=0.02inch, Working Voltage=50V
R7 R9 R26 R27: library part RC0402FR-072K2L, "RES SMD 2.2K OHM 1% 1/16W 0402", Case Code (Imperial)=0402, Case Code (Metric)=1005, LCSC Part Number=C114762, Manufacturer=Yageo, Max Operating Temperature=155°C, Max Power Dissipation=63mW, Min Operating Temperature=-55°C, Resistance=2.2kR, Resistance Tolerance=1%, Resistor Type="Thick Film", Supplier Part Number 1=311-2.20KLRCT-ND, Temperature Coefficient=100ppm/°C, Voltage Rating=50V, Case/Package=0402, ComponentLink1Description=http://www.farnell.com/datasheets/2167052.pdf?src-supplier=Element14, ComponentLink1URL=http://www.farnell.com/datasheets/2167052.pdf?src-supplier=Element14, ComponentLink2Description=http://www.yageo.com/documents/recent/PYu-RC_Group_51_RoHS_L_9.pdf?src-supplier=Mouser, ComponentLink2URL=http://www.yageo.com/documents/recent/PYu-RC_Group_51_RoHS_L_9.pdf?src-supplier=Mouser, ComponentLink3Description=http://documents.rs-components.com/techlib://itc_doclist_GB.htm?stockno=6186532&src-supplier=RSComponents, ComponentLink3URL=http://documents.rs-components.com/techlib://itc_doclist_GB.htm?stockno=6186532&src-supplier=RSComponents, ComponentLink4Description=http://www.yageo.com/documents/recent/PYu-RC0402_51_RoHS_L_6_r.pdf?src-supplier=Future+Electronics, ComponentLink4URL=http://www.yageo.com/documents/recent/PYu-RC0402_51_RoHS_L_6_r.pdf?src-supplier=Future+Electronics, Construction=Rectangular, Depth=0.5mm, Features="Moisture Resistant", Height=0.35mm, Lead Free="Lead Free", Length=1mm, Manufacturer Part Number=RC0402FR-072K2L, Military Standard=Not, Number of Terminations=2, Packaging="Tape and Reel", Power Rating=63mW, Pricing 1="1=0.1, 10=0.016, 100=0.0066, 1000=0.00299, 2500=0.00259, 5000=0.00214 (USD)", REACH SVHC=Unknown, RoHS Compliant=Yes, Series=RC, Size Code=0402, Stock 1=966157, Supplier 1=Digi-Key, Technology="THICK FILM", Termination=SMD/SMT, Tolerance=1%, Weight=2.3E-05oz, Width=0.5mm
R10 R13 R14 R15: library part RC0402FR-0747KL, "RES 47K OHM 1% 1/16W 0402", Case Code (Imperial)=0402, Case Code (Metric)=1005, LCSC Part Number=C93943, Manufacturer=Yageo, Max Operating Temperature=155°C, Max Power Dissipation=63mW, Min Operating Temperature=-55°C, Package Quantity=1, Power Rating=62.5mW, Resistance=47kR, Resistance Tolerance=1%, Resistor Type="Thick Film", Temperature Coefficient=100ppm/°C, Voltage Rating=50V, Case/Package=0402, Category="Chip SMD Resistors", ComponentLink1Description=https://datasheet.ciiva.com/46412/1018594-46412839.pdf?src-supplier=Element14, ComponentLink1URL=https://datasheet.ciiva.com/46412/1018594-46412839.pdf?src-supplier=Element14, ComponentLink2Description=https://datasheet.ciiva.com/2453/pyu-r-int-thick-7-2453389.pdf?src-supplier=Digi-Key, ComponentLink2URL=https://datasheet.ciiva.com/2453/pyu-r-int-thick-7-2453389.pdf?src-supplier=Digi-Key, ComponentLink3Description=https://datasheet.ciiva.com/2453/pyu-r-int-thick-7-2453390.pdf?src-supplier=Digi-Key, ComponentLink3URL=https://datasheet.ciiva.com/2453/pyu-r-int-thick-7-2453390.pdf?src-supplier=Digi-Key, ComponentLink4Description=https://datasheet.ciiva.com/2453/pyu-r-int-thick-7-2453388.pdf?src-supplier=Digi-Key, ComponentLink4URL=https://datasheet.ciiva.com/2453/pyu-r-int-thick-7-2453388.pdf?src-supplier=Digi-Key, ComponentLink5Description=https://datasheet.ciiva.com/15189/getdatasheetpartid-323748-15189466.pdf?src-supplier=Verical, ComponentLink5URL=https://datasheet.ciiva.com/15189/getdatasheetpartid-323748-15189466.pdf?src-supplier=Verical, ComponentLink6Description=https://datasheet.ciiva.com/16793/pyu-rc0402-51-rohs-l-6-r-16793430.pdf?src-supplier=Future+Electronics, ComponentLink6URL=https://datasheet.ciiva.com/16793/pyu-rc0402-51-rohs-l-6-r-16793430.pdf?src-supplier=Future+Electronics, Construction=Rectangular, Depth=0.5mm, Features="Moisture Resistant", Height=0.016inch, Item Type=Resistor, Lead Free="Lead Free", Length=1mm, Manufacturer Part Number=RC0402FR-0747KL, Military Standard=Not, Number of Terminations=2, Packaging="Tape and Reel", Pricing 1="10000=0.00085, 20000=0.00087, 40000=0.00084, 60000=0.00083, 80000=0.00079, 100000=0.00078, 1000000=0.00076 (USD)", RoHS=Yes, RoHS Compliant=Yes, Series=RC, Size Code=0402, Stock 1=680000, Supplier 1=Avnet, Supplier Part Number 1=RC0402FR-0747KL, Termination=SMD/SMT, Tolerance=1%, Width=0.02inch
R25: library part RC0402FR-07100KL, "RES 100K OHM 1% 1/16W 0402", Case Code (Imperial)=0402, Case Code (Metric)=1005, LCSC Part Number=C60491, Manufacturer=Yageo, Max Operating Temperature=155°C, Max Power Dissipation=63mW, Min Operating Temperature=-55°C, Package Quantity=1, Resistance=100kR, Resistance Tolerance=1%, Resistor Type="Thick Film", Supplier Part Number 1=603-RC0402FR-07100KL, Temperature Coefficient=100ppm/°C, Voltage Rating=50V, Case/Package=0402, Category="Chip SMD Resistors", ComponentLink1Description=https://datasheet.ciiva.com/11819/0900766b80c66297-11819452.pdf?src-supplier=RSComponents, ComponentLink1URL=https://datasheet.ciiva.com/11819/0900766b80c66297-11819452.pdf?src-supplier=RSComponents, ComponentLink2Description=https://datasheet.ciiva.com/22747/1018594-22747509.pdf?src-supplier=Element14, ComponentLink2URL=https://datasheet.ciiva.com/22747/1018594-22747509.pdf?src-supplier=Element14, ComponentLink3Description=https://datasheet.ciiva.com/2453/pyu-r-int-thick-7-2453362.pdf?src-supplier=Digi-Key, ComponentLink3URL=https://datasheet.ciiva.com/2453/pyu-r-int-thick-7-2453362.pdf?src-supplier=Digi-Key, ComponentLink4Description=https://datasheet.ciiva.com/2453/pyu-r-int-thick-7-2453363.pdf?src-supplier=Digi-Key, ComponentLink4URL=https://datasheet.ciiva.com/2453/pyu-r-int-thick-7-2453363.pdf?src-supplier=Digi-Key, ComponentLink5Description=https://datasheet.ciiva.com/2453/pyu-r-int-thick-7-2453361.pdf?src-supplier=Digi-Key, ComponentLink5URL=https://datasheet.ciiva.com/2453/pyu-r-int-thick-7-2453361.pdf?src-supplier=Digi-Key, ComponentLink6Description=https://datasheet.ciiva.com/12667/pyu-rc0402-51-rohs-l-6-r-12667930.pdf?src-supplier=Mouser, ComponentLink6URL=https://datasheet.ciiva.com/12667/pyu-rc0402-51-rohs-l-6-r-12667930.pdf?src-supplier=Mouser, ComponentLink7Description=https://datasheet.ciiva.com/15189/getdatasheetpartid-323696-15189334.pdf?src-supplier=Verical, ComponentLink7URL=https://datasheet.ciiva.com/15189/getdatasheetpartid-323696-15189334.pdf?src-supplier=Verical, Construction=Rectangular, Depth=0.5mm, Features="Moisture Resistant", Height=0.016inch, Item Type=Resistor, Lead Free="Lead Free", Length=0.039inch, Manufacturer Part Number=RC0402FR-07100KL, Military Standard=Not, Number of Terminations=2, Packaging="Tape and Reel", Power Rating=63mW, Pricing 1="1=0.10000, 10=0.01200, 50=0.01200, 100=0.00500, 1000=0.00300, 2500=0.00200, 10000=0.00100 (USD)", REACH SVHC="No SVHC", RoHS=Yes, RoHS Compliant=Yes, Series=RC, Stock 1=7759549, Supplier 1=Mouser, Technology="THICK FILM", Termination=SMD/SMT, Tolerance=1%, Width=0.02inch, Working Voltage=50V
U: library part TPS54339EDDA, "4.5V to 23V Input, 3A Synchronous Step-Down Converter with D-CAP2 Mode and Light Load Efficiency 8-SO PowerPAD -40 to 85", Package="HSOIC-8 Texas Instruments", Availability=Unavailable, MF="Texas Instruments", MP=TPS54339EDDA, Price=None, SnapEDA_Link=https://www.snapeda.com/parts/TPS54339EDDA/Texas%20Instruments/view-part/1156774/?ref=snap
U1: "SENSOR OPTICAL 20-10000CM I2C", Current Rating=50mA, LCSC Part Number=C3178303, Manufacturer=STMicroelectronics, Max Operating Temperature=85°C, Max Supply Voltage=3.3V, Min Operating Temperature=-30°C, Min Supply Voltage=2.5V, China RoHS=Compliant, Height=1.5mm, Item Type=Sensors, Length=6.4mm, Lifecycle Status=Production, Manufacturer Part Number=VL53L5CXV0GC/1, Mounting Technology="Surface Mount", Pricing="3600=4.313 (USD)", REACH SVHC=Yes, Response Time=120ns, RoHS=Compliant, Schedule B="8542390000, 8542390000|8542390000|8542390000|8542390000|8542390000|8542390000|8542390000|8542390000|8542390000|8542390000|8542390000|8542390000|8542390000|8542390000|8542390000|8542390000|8542390000|8542390000|8542390000|8542390000|8542390000|8542390000|8542390000|85", Sensing Distance=4m, Stock=50400, Supplier="Arrow Electronics"
U2: "SMD,18x25.5mm WiFi Modules ROHS", LCSC Part Number=C2913203, Manufacturer="Espressif Systems", Supplier Part Number 1=1965-ESP32-S3-WROOM-1-N4R2CT-ND, Category=Uncategorized, ComponentLink1Description=LCSC, ComponentLink1URL=https://www.lcsc.com/product-detail/WiFi-Modules_Espressif-Systems-ESP32-S3-WROOM-1-N4R2_C2913203.html, Item Type=Module, Manufacturer Part Number=ESP32-S3-WROOM-1-N4R2, RoHS=No, Supplier 1=Digikey
U3: library part ULN2003-2, "达林顿驱动芯片", BOM名称=达林顿驱动芯片, 学习资源=www.ooocke.com, 版权归属=源创客
U4: "ACCEL 2-16G I2C/SPI 12LGA", Case/Package=LGA, LCSC Part Number=C189624, Manufacturer=STMicroelectronics, Max Operating Temperature=85°C, Min Operating Temperature=-40°C, Supplier Part Number=511-LIS2DW12TR, Axis="X, Y, Z", Bandwidth=400Hz, Category=Accelerometers, ComponentLink1Description=http://www.farnell.com/datasheets/2581666.pdf?src-supplier=Farnell, ComponentLink1URL=http://www.farnell.com/datasheets/2581666.pdf?src-supplier=Farnell, Item Type=IC, Manufacturer Part Number=LIS2DW12TR, Mounting Technology="Surface Mount", Output Type=SPI,I2C, Packaging="Cut Tape", Pins=12, Pricing="1=2.65, 10=2.16, 50=2.16, 100=1.54, 1000=1.21, 10000=0.988 (USD)", RoHS=Yes, RoHS Compliant=Yes, Series=-, Stock=14817, Supplier=Mouser
U5: "INTEGRATED LIGHT SOURCE INTELLIGENT CONTROL OF / CHIP-ON-TOP SMD TYPE LED"
U8: "LGA-8(2x2.5) Pressure Sensors ROHS", LCSC Part Number=C2684428, Manufacturer=Goertek, Package=LGA-8(2x2.5), Item Type=Sensor, Manufacturer Part Number=SPL06-001
USB1: "3A 1 Surface Mount，Right Angle 16P Female -40℃~+85℃ Type-C SMD USB Connectors ROHS", LCSC Part Number=C709357, Manufacturer="Shenzhen Kinghelm Elec", Package=SMD, ComponentLink1Description=LCSC, ComponentLink1URL=https://www.lcsc.com/product-detail/USB-Connectors_Shenzhen-Kinghelm-Elec-KH-TYPE-C-16P_C709357.html, Item Type="Type-C SMD USB", Manufacturer Part Number=KH-TYPE-C-16P

## Via types
v1: diameter 20, hole 10, Top Layer to Bottom Layer, tented both sides, 108 vias
v2: diameter 20, hole 10, Top Layer to Bottom Layer, 10 vias

## Nets (pads, with @x,y where several pads share a name; then routed paths per layer and width w, separated by ;. In a path a pad name is that pad's centre, name@x,y a point inside that pad or via, vN(x,y) a via of type N, cw(c..) or ccw(c..) an arc to the next point about the centre after c; other vN are vias at no path point)
1IN: U2.18 U3.1 | length 1523.6
  Top Layer w20: U2.18 v1(626.27,1230.59)
  Bottom Layer w10: v1(626.27,1230.59) 626.27,1090.56 693.59,1023.24 931.45,1023.24 963.2,991.49 963.2,290.83 954.4,282.03 v1(767.38,282.03)
2IN: U2.17 U3.2 | length 1658.6
  Top Layer w20: U2.17 v1(647.15,1280.59)
  Bottom Layer w10: v1(647.15,1280.59) 647.15,1095.14 701.04,1041.24 938.9,1041.24 981.2,998.94 981.2,245.39 967.84,232.03 v1(767.38,232.03)
3.3V: C1.1 C3.1 C4.1 C6.1 C7.1 C8.1 C9.1 C11.1 C15.2 C17.1 C20.1 C30.2 C31.1 J1.7 J1.10 JP2.4 L2.1 R3.1 R4.2 R7.2 R9.2 R13.2 R14.2 R15.2 R26.2 R27.2 U1.A4 U1.B1 U1.B7 U2.2 U4.2 U4.9 U4.10 U5.2 U8.6 U8.8 | length 850.3
  Top Layer w8: R4.2@831.82,1572.46 cw(c831.82,1569.71) R4.2
  Top Layer w15: R9.2 R4.2@831.82,1572.46
  Top Layer w20: v1(1170,1402.25) U2.2
  Bottom Layer w8: v1(137.19,1164.84) 197.54,1164.84 207.6,1174.9 R13.2 R13.2@211.1,1199 ; C11.1@244.22,1232.13 247.49,1232.13 C11.1
  Bottom Layer w10: R13.2@211.1,1199 C11.1@244.22,1232.13 ; C11.1@253.33,1236 R14.2@288.83,1200.5 ; v1(953.72,1532.89) 953.72,1496.15 962.19,1487.68 1061.45,1487.68 1146.89,1402.25 v1(1170,1402.25)
  Bottom Layer w15: v1(111.64,1330.59) U1.B1 ; R15.2 v1(190.23,1499.64) ; C11.1 C11.1@253.33,1236 ; C11.1@251.36,1236.37 U1.A4 ; R14.2@288.83,1200.5 293.75,1200.5 R14.2 ; U1.B7 C7.1
  other v1: -30.51,533.28 724.18,550.94 3.92,610.23 870.46,641.2 920.29,641.2 724.18,669.06 223.6,706.64 164.79,708.6 23.1,846.89 66.08,846.89 -74.73,1295.01 -74.73,1330.59 -26.83,1330.59 22.38,1330.59 382.47,1330.6 834.57,1585.45 591.96,1634.17
3IN: U2.12 U3.3 | length 1764.8
  Top Layer w20: v1(670,1325.18) U2.12
  Bottom Layer w10: v1(670,1325.18) 670,1097.74 708.5,1059.24 946.36,1059.24 999.2,1006.4 999.2,200.69 980.54,182.03 v1(767.38,182.03)
4IN: U2.7 U3.4 | length 2041.5
  Top Layer w20: v1(920,1325.18) U2.7
  Bottom Layer w10: v1(767.38,132.03) 997.89,132.03 1017.2,151.34 1017.2,1013.86 953.82,1077.24 715.96,1077.24 690.43,1102.77 690.43,1291.84 723.77,1325.18 v1(920,1325.18)
CC1: R5.1 USB1.A5 | length 59.9
  Top Layer w12: R5.1 364.5,182.5 369.5,177.5 369.5,177.41 377.08,169.83 USB1.A5
CC2: R6.1 USB1.B5 | length 52.5
  Top Layer w12: R6.1@489.5,181.5 495.19,175.81 USB1.B5
D_N: ESD2.2 J1.2 USB1.A7 USB1.B7 | length 1192.7
  Top Layer w12: USB1.B7 396.76,94.03 403.79,87 429.1,87 437.34,95.24 437.34,149.65 434.79,152.2 434.79,170.84 438.79,174.84 v2(438.79,177) 438.79,179.16 434.79,183.16 434.79,200.91 443.09,209.22 ESD2.2 ; v1(414.86,636.87) 417.02,636.87 421.02,640.87 443.42,640.87 454.61,629.69 J1.2
  Bottom Layer w10: v1(414.86,636.87) 412.69,636.87 408.69,640.87 194.28,640.87 174.43,621.02 174.43,352.47 217.13,309.77 416.78,309.77 434.79,291.76 434.79,183.16 438.79,179.16 v2(438.79,177)
D_P: ESD1.2 J1.1 USB1.A6 USB1.B6 | length 1271.2
  Top Layer w12: ESD1.2 408.91,209.22 417.79,200.34 417.79,183.16 413.79,179.16 v2(413.79,177) 413.79,174.84 417.79,170.84 417.79,152.2 416.45,150.86 USB1.A6 ; v1(414.86,661.87) 417.02,661.87 421.02,657.87 443.42,657.87 454.61,669.06 J1.1 ; USB1.B6 455.82,111.86 454.34,110.38 454.34,93.3 458.47,89.16 v2(458.47,87)
  Bottom Layer w10: v1(414.86,661.87) 412.69,661.87 408.69,657.87 187.24,657.87 157.43,628.06 157.43,345.43 210.09,292.77 409.74,292.77 417.79,284.72 417.79,183.16 413.79,179.16 v2(413.79,177) 415.32,175.47 415.32,103.25 431.57,87 v2(458.47,87)
DTR: J1.4 Q2.2 R8.1
ECHO: JP2.2 U2.5 | length 2388.6
  Top Layer w20: U2.5 1020,1328.71 v1(1020.66,1328.05)
  Bottom Layer w10: JP2.2 437.13,435.21 454.25,452.34 635.93,452.34 676.11,412.15 676.11,114.84 718.78,72.17 1011.32,72.17 1053.2,114.05 1053.2,1295.51 v1(1020.66,1328.05)
EN: C5.1 C10.1 KEY1.2 KEY1.3 Q1.3 R4.1 U2.3 | length 2829.9
  Top Layer w12: 384.62,1630.28 402.77,1612.13 842.97,1612.13 cw(c842.97,1597.14) 857.96,1597.14 857.96,1537.07 ccw(c858.79,1537.07) v1(858.79,1536.24) ; R4.1@832.69,1538.12 R4.1
  Top Layer w20: v1(1101.64,1357.51) 1120,1375.87 U2.3
  Bottom Layer w10: v1(816,457.87) 931.65,457.87 945.2,471.42 945.2,984.03 923.99,1005.24 686.13,1005.24 600.69,1090.69 600.69,1343.65 614.55,1357.51 v1(1101.64,1357.51) 1101.64,1420.61 1052.57,1469.68 880.16,1469.68 858.79,1491.06 v1(858.79,1536.24)
GND: C1.2 C2.2 C3.2 C4.2 C5.2 C6.2 C7.2 C8.2 C9.2 C10.2 C11.2 C14.1 C16.2 C17.2 C20.2 C21.2 C28.2 C30.1 C31.2 ESD1.1 ESD2.1 ESD3.1 J1.3 J1.11 JP2.1 KEY1.1 KEY1.4 LED1.2 R5.2 R6.2 R10.2 R12.2 R25.2 U1.A2 U1.A6 U1.A7 U1.B4 U1.C1 U1.C6 U1.C7 U2.1 U2.40 U2.41 U3.8 U4.6 U4.7 U4.8 U5.4 U8.1 U8.7 U.4 USB1.1 USB1.2 USB1.3 USB1.4 USB1.A1 USB1.A12 USB1.B1 USB1.B12 | length 717.3
  Top Layer w10: U8.7 -4.93,584.65 3.92,575.79 v1(3.92,559)
  Top Layer w15: v2(268.83,153.26) 269.64,154.07 288.18,154.07 294.4,147.86 294.4,147.6 USB1.A1@298,144 ; R5.2 v2(361,247) ; R6.2 v2(491,247) ; USB1.A12@554.96,131.36 ESD3.1 ; ESD3.1 v2(554.99,217.23)
  Top Layer w20: U2.40 v1(1220,800.83) ; v1(1220,1402.25) U2.1
  Bottom Layer w8: v1(137.19,1199) R10.2 ; C11.2 251.37,1171.61 261.21,1161.77 v1(323.6,1161.77) ; v1(444.67,1288.33) C7.2
  Bottom Layer w15: U1.C1 v1(162.78,1402.7) ; U1.A6@310.41,1288.79 444.21,1288.79 v1(444.67,1288.33) ; U1.C6 v1(310.41,1402.7) ; U1.C7 v1(339.94,1402.7)
  other v1: 663.15,-67.97 197.74,-42 1002.29,-16.67 98.14,164.56 157.43,308.48 -87.6,534.45 80.59,610.23 796.1,669.05 273.74,706.64 373.6,706.64 -30.36,740.1 -2.91,790.83 165.05,849.87 23.1,919.05 223.6,1074.05 882.44,1128.31 954.57,1128.31 -68.66,1156.91 920,1164.84 880.3,1198.31 954.57,1198.31 251.36,1569.71 398.59,1569.71 882.44,1587.42 930.14,1587.42 512.54,1634.38 994.27,1637.09
  other v2: 396,264 456,264
INT: R25.1 U2.23 U8.5 | length 881
  Top Layer w12: R25.1 94.39,670.31 111.64,687.56 v1(111.64,1001.87)
  Top Layer w20: v1(477,980.59) U2.23@520.2,980.59
  Bottom Layer w10: v1(111.64,1001.87) 455.72,1001.87 v1(477,980.59)
INT1: U2.19 U4.12 | length 853.6
  Top Layer w8: v1(-68.97,905.81) -68.41,905.25 -68.41,857.48 U4.12
  Top Layer w20: v1(473.06,1180.59) U2.19
  Bottom Layer w10: v1(-68.97,905.81) -68.97,1077.75 -29.75,1116.97 356.21,1116.97 419.83,1180.59 v1(473.06,1180.59)
INT2: U2.20 U4.11 | length 808.2
  Top Layer w8: U4.11 -47.88,857.2 -47.88,880.31 v1(-47.59,880.59)
  Top Layer w20: v1(473.06,1130.59) U2.20
  Bottom Layer w10: v1(-47.59,880.59) -47.59,1072.45 -21.07,1098.97 363.66,1098.97 395.28,1130.59 v1(473.06,1130.59)
INT_1: R13.1 U1.A3 U2.8 | length 934.2
  Top Layer w10: v1(191.63,1259.64) 191.63,1360.98 206.52,1375.87 v1(414.86,1375.87)
  Top Layer w20: v1(870,1402.25) U2.8
  Bottom Layer w10: v1(191.63,1259.64) 216.76,1259.64 221.83,1254.57 ; R13.1@211.18,1237.36 212.45,1237.36 214.1,1239 214.1,1240.27 221.83,1248.01 221.83,1254.57 ; U1.A3 221.83,1254.57 ; v1(414.86,1375.87) 441.23,1402.25 v1(870,1402.25)
IO0: Q2.3 U2.27 | length 312.4
  Top Layer w8: U2.27@569.76,761.05 U2.27
  Top Layer w20: v1(532.26,762.66) 533.87,761.05 U2.27@569.76,761.05
  Bottom Layer w10: v1(291.47,682.78) 394.32,682.78 474.2,762.66 v1(532.26,762.66)
LED: U2.4 U5.1 | length 621.9
  Top Layer w20: v1(1070,1402.25) U2.4
  Bottom Layer w10: v1(636.11,1634.29) 636.11,1583.93 648.43,1571.62 748.64,1571.62 868.57,1451.68 1045.11,1451.68 1069.54,1427.25 1069.54,1402.71 v1(1070,1402.25)
LPn_1: R14.1 U1.A5 U2.9 | length 772.9
  Top Layer w20: U2.9 820,1380.58 v1(820.34,1380.23)
  Bottom Layer w10: U1.A5 279.97,1288.33 279.97,1247.78 R14.1@288.75,1239 ; R14.1 458.43,1236 477,1254.57 477,1363.15 494.08,1380.23 v1(820.34,1380.23)
NetC15_1: C15.1 R3.2 R12.1 U.5
NetC16_1: C16.1 U.8
NetC27_1: C27.1 U.1
NetC27_2: C27.2 L2.2 U.3
NetC28_1: C28.1 U.6
NetESD3_2: ESD3.2 F6.2 USB1.A4 USB1.A9 USB1.B4 USB1.B9
NetJP1_1: JP1.1 U3.16 | length 456.8
  Top Layer w30: U3.16@929.27,286.44 929.27,451.4 cw(c1029.27,451.4) 958.56,522.11 1017.2,580.76 ; 1017.23,580.79 cw(c1087.31,510.64) 1087.31,609.8 JP1.1
NetJP1_2: JP1.2 U3.15 | length 477.7
  Top Layer w30: U3.15@903,232.03 U3.15 980.32,232.03 ccw(c980.32,268.91) 1017.2,268.91 1017.2,460.8 cw(c1066.2,460.8) 1066.2,509.8 JP1.2
NetJP1_3: JP1.3 U3.14 | length 431.2
  Top Layer w30: U3.14@903,182.03 U3.14 1037.43,182.03 ccw(c1037.43,213.82) 1069.22,213.82 1069.22,368.11 cw(c1107.42,368.11) 1103.57,406.12 JP1.3 ccw(c1137.23,434.66) JP1.3
NetJP1_4: JP1.4 U3.13 | length 545.2
  Top Layer w30: U3.13@902.28,132.03 U3.13 1181.19,132.03 ccw(c1181.19,170.84) 1220,170.84 1220,277.51 ccw(c1187.72,277.51) 1187.72,309.8 JP1.4
NetLED1_1: LED1.1 R1.2 | length 161.4
  Top Layer w12: R1.2@146.76,181.65 148.64,179.78 148.64,179.48 165.05,163.07 LED1.1
NetQ1_1: Q1.1 R8.2 | length 536.5
  Bottom Layer w10: v1(388.75,600.34) 388.75,555.64 406.39,538 629.76,538 649.18,518.58 824.82,518.58 v1(853.4,547.16)
NetQ2_1: Q2.1 R11.2 | length 569.4
  Bottom Layer w10: v1(254.07,518.75) 620.86,518.75 639.84,499.76 709.97,499.76 724.99,484.74 v1(724.99,400.38)
NetR2_1: R2.1 U.7
  other v2: 323.76,775.69
NetR15_1: R15.1 U1.C2 | length 52.3
  Bottom Layer w12: U1.C2 R15.1@192.3,1424.25
RST_1: R10.1 U1.A1 U2.22 | length 878.9
  Top Layer w20: v1(477.59,1030.59) U2.22
  Bottom Layer w10: R10.1@162.89,1237 124.24,1237 111.64,1224.4 111.64,1149.31 123.82,1137.13 348.7,1137.13 420.57,1209 504.47,1209 524.56,1188.91 524.56,1046.56 509,1031 v1@477.59,1031
  Bottom Layer w12: U1.A1 162.89,1289.15 R10.1@162.89,1237
RTS: J1.6 Q1.2 R11.1
RXD: J1.9 U2.37 | length 522.1
  Top Layer w12: J1.9 790.47,629.69 840.83,579.33 958.06,579.33 1070,691.27 U2.37
SCL: R27.1 U2.34 U4.1 U8.4 | length 1331.4
  Top Layer w8: U8.4@-88.08,636.31 U8.4 ; U4.1 -87.76,856.69 -87.76,880.43 v1(-87.6,880.59)
  Top Layer w10: U8.4@-88.08,636.31 -87.6,636.79 v1(-87.6,699.44)
  GND w6: v1(-87.6,699.44) -55.55,699.44 0.7,643.2 363.83,643.2 412.03,691.4 894.54,691.4 v1(920.46,717.31)
  Bottom Layer w10: v1(-87.6,699.44) v1(-87.6,880.59)
SCL_1: R9.1 U1.C4 U2.11 | length 672.4
  Top Layer w12: U2.11 R9.1
  Bottom Layer w12: U1.C4 251.36,1484.18 267.1,1499.92 v1(719.84,1499.92)
SDA: R26.1 U2.33 U4.4 U8.3 | length 1204
  Top Layer w10: U4.4 -87.92,750.94 v1(-60.04,723.06) -60.04,618.78 -68.6,610.23 U8.3
  GND w6: v1(-60.04,723.06) -59.15,723.06 6.71,657.2 357.62,657.2 406.17,705.74 858.89,705.74 v1(870.46,717.31)
SDA_1: R7.1 U1.C3 U2.10 | length 788.9
  Top Layer w12: U2.10 R7.1
  Bottom Layer w12: U1.C3 221.83,1500.64 254.09,1532.89 736.87,1532.89 v1(769.84,1499.92)
TRIG: JP2.3 U2.6 | length 2517.1
  Top Layer w20: U2.6 970,1303.78 v1(970.22,1303.56)
  Bottom Layer w10: JP2.3 337.13,446.1 363.89,472.87 643.89,472.87 694.45,422.31 694.45,121.96 726.24,90.17 1003.87,90.17 1035.2,121.51 1035.2,1285.21 1016.84,1303.56 v1(970.22,1303.56)
TXD: J1.8 U2.36 | length 414.7
  Top Layer w12: v1(870,610.23) 951.01,610.23 1020,679.22 U2.36
  Bottom Layer w10: v1(724.18,590.32) 850.09,590.32 v1(870,610.23)
VIN5V: C2.1 C14.2 C21.1 F6.1 JP1.5 R1.1 R2.2 U3.9 U.2
  other v1: 980.63,-67.23 98.15,231.48 144.79,230.86 180.06,255.58 215.73,255.58 323.75,706.64 323.6,1074.05
pads on no net: J1.5 U1.C5 U2.13 U2.14 U2.15 U2.16 U2.21 U2.24 U2.25 U2.26 U2.28 U2.29 U2.30 U2.31 U2.32 U2.35 U2.38 U2.39 U3.5 U3.6 U3.7 U3.10 U3.11 U3.12 U4.3 U4.5 U5.3 U8.2 U.9 U.10 U.11 U.12 U.13 U.14 U.15 U.16 U.17 USB1.A8 USB1.B8

## Polygon pours and split planes (outlines as drawn)
GND on Top Layer "GND_L01_P013" (solid, pour order 13): -139.23,-83.02 -139.23,1679.18 -139.51,1681.13 cw(c-92.21,1684.49) -95.57,1731.79 -94.81,1731.79 1231.89,1731.79 1232.83,1731.7 cw(c1231.64,1684.29) 1278.94,1687.65 1278.86,1685.57 1278.86,-72.82 1278.86,-75.82 cw(c1231.44,-75.82) 1238.05,-122.78 1236.19,-123.14 -88.48,-123.14 -88.56,-123.14 cw(c-91.91,-75.84)
NetESD3_2 on Top Layer "NETESD3_2_L01_P010" (solid, pour order 10): 311.61,178.49 279.9,178.49 279.9,240 326.93,240 326.93,185.07 338.27,173.73 338.27,98.36 356.63,80 494.83,80 513.43,98.6 513.43,203.16 535.79,203.16 535.79,44.05 510.74,19 342.57,19 321.83,39.74 321.83,168.27
GND on GND "GND_L02_P016" (solid, pour order 16): -139.23,-83.02 -139.23,1679.18 -139.51,1681.13 cw(c-92.21,1684.49) -95.57,1731.79 -94.81,1731.79 1231.89,1731.79 1232.83,1731.7 cw(c1231.64,1684.29) 1278.94,1687.65 1278.86,1685.57 1278.86,-72.82 1278.86,-75.82 cw(c1231.44,-75.82) 1238.05,-122.78 1236.19,-123.14 -88.48,-123.14 -88.56,-123.14 cw(c-91.91,-75.84)
VIN5V on POWER "VIN5V_L03_P014" (solid, pour order 14): 285.29,299.82 285.29,1128.31 568.62,1128.31 568.62,299.82 1273.84,299.82 1273.84,-106.93 940.46,-106.93 -120.3,-106.93 -120.3,299.82
3.3V on POWER "3.3V_L03_P017" (solid, pour order 17): -139.23,-83.02 -139.23,1679.18 -139.51,1681.13 cw(c-92.21,1684.49) -95.57,1731.79 -94.81,1731.79 1231.89,1731.79 1232.83,1731.7 cw(c1231.64,1684.29) 1278.94,1687.65 1278.86,1685.57 1278.86,-72.82 1278.86,-75.82 cw(c1231.44,-75.82) 1238.05,-122.78 1236.19,-123.14 -88.48,-123.14 -88.56,-123.14 cw(c-91.91,-75.84)
GND on Bottom Layer "GND_L04_P015" (solid, pour order 15): -139.23,-83.02 -139.23,1679.18 -139.51,1681.13 cw(c-92.21,1684.49) -95.57,1731.79 -94.81,1731.79 1231.89,1731.79 1232.83,1731.7 cw(c1231.64,1684.29) 1278.94,1687.65 1278.86,1685.57 1278.86,-72.82 1278.86,-75.82 cw(c1231.44,-75.82) 1238.05,-122.78 1236.19,-123.14 -88.48,-123.14 -88.56,-123.14 cw(c-91.91,-75.84)

## Keep-outs
Keep-Out Layer:
  circle w5: c1155.83,1608.66 r59.06
  circle w5: c1155.83,1608.66 r59.06
  circle w5: c1155.83,-0.01 r59.06
  circle w5: c0,1609.09 r59.06
  circle w5: c0,0 r59.06
  circle w5: c0,1609.09 r59.06
  circle w5: c0,0 r59.06
  circle w5: c1155.83,-0.01 r59.06
  lines w5: -134.51,1681.49 cw(c-92.21,1684.49) -95.21,1726.79 ccw(c-92.21,1684.49) -134.51,1681.49 ; -134.21,-78.82 ccw(c-91.91,-75.82) -88.91,-118.12 cw(c-91.91,-75.82) -134.21,-78.82 ; 1228.64,1726.59 cw(c1231.64,1684.29) 1273.94,1687.29 ccw(c1231.64,1684.29) 1228.64,1726.59 ; 1234.44,-118.12 ccw(c1231.44,-75.82) 1273.74,-72.82 cw(c1231.44,-75.82) 1234.44,-118.12
  lines w6.16: -134.21,-82.02 -134.21,1680.18 -134.21,-82.02 ; -95.21,1726.77 1231.88,1726.77 -95.21,1726.77 ; -88.91,-118.12 1236.19,-118.12 -88.91,-118.12 ; 1273.94,-72.82 1273.94,1685.57 1273.94,-72.82

## Other copper
Top Layer:
  rectangle net EN: 329.39,1597.84 439.84,1662.72
  rectangle net EN: 824.72,1528.37 892.28,1544.12
  rectangle net GND: 984.43,1603.36 1004.12,1637.09
  rectangle net GND: 920.29,1563.8 939.98,1587.42
  rectangle net GND: 872.6,1563.8 892.29,1587.42
  rectangle net 3.3V: 824.72,1561.83 844.41,1585.45
  rectangle net 3.3V: 920.29,1521.5 1022.69,1544.12
  rectangle net IO0: 282.68,639.91 300.4,682.78
  region net GND: 167.27,332.1 147.59,332.1 147.59,308.48 167.27,308.48
  rectangle net 3.3V: 147.59,359.66 237.13,375.4
  rectangle net VIN5V: 80.43,205.58 240.1,271.2
  region net GND: 165.05,-32.16 165.05,-51.84 197.74,-51.84 197.74,-32.16
  region net GND: 107.99,188.18 88.3,188.18 88.3,164.56 107.99,164.56
  rectangle net GND: 182.17,1556.16 378.61,1583.72
  rectangle net EN: 182.39,1635.16 378.61,1662.72
  region net GND: 354,1579.78 354,1559.56 439.84,1559.56 439.84,1579.78
  region net 3.3V: 601.8,1671.85 582.11,1671.85 582.11,1634.17 601.8,1634.17
  region net LED: 645.95,1671.97 626.27,1671.97 626.27,1634.29 645.95,1634.29
  region net GND: 522.38,1672.07 502.69,1672.07 502.69,1634.38 522.38,1634.38
  region net GND: 59.97,620.07 59.97,600.39 80.59,600.39 80.59,620.07
  region net 3.3V: 24.54,600.39 24.54,620.07 3.92,620.07 3.92,600.39
  region net GND: -77.75,567.91 -97.44,567.91 -97.44,534.45 -77.75,534.45
  rectangle net 3.3V: -39.37,513.59 -21.66,559.05
  rectangle net 3.3V: -30.52,601.37 32.44,619.09
  rectangle net GND: -40.36,699.44 -20.67,740.1
  rectangle net INT: -39.37,626.97 -21.66,670.31
  rectangle net GND: 13.26,895.43 32.95,919.05
  rectangle net GND: -55.05,782.82 75.92,798.57
  rectangle net 3.3V: -2.91,818.25 75.92,875.75
  rectangle net 3.3V: -28.08,829.95 75.92,863.42
  rectangle net GND: -55.05,789.2 -20.2,824.05
  rectangle net 3.3V: -87.92,829.95 -28.08,843.73
  region net GND: 462.78,264 449,264 449,228.91 462.78,228.91
  rectangle net GND: 389.22,228.91 403,264
  rectangle net NetQ1_1: 378.91,576.72 398.59,600.34
  rectangle net NetQ1_1: 844.61,515.27 862.32,547.16
  region net NetQ2_1: 734.84,427 715.15,427 715.15,400.38 734.84,400.38
  region net NetQ2_1: 262.87,550.64 245.15,550.64 245.15,518.75 262.87,518.75
  rectangle net DTR: 328.88,539.13 494.37,562.76
  rectangle net RTS: 659.33,444.72 787.46,523.39
  rectangle net EN: 807.2,425.98 824.92,457.87
  region net TXD: 685.12,600.16 685.12,580.47 724.18,580.47 724.18,600.16
  region net 3.3V: 685.12,560.79 685.12,541.1 724.18,541.1 724.18,560.79
  rectangle net 3.3V: 685.12,659.21 752.79,678.9
  region net GND: 772.48,678.89 772.48,659.21 796.1,659.21 796.1,678.89
  region net 3.3V: 930.14,660.2 910.45,660.2 910.45,641.2 930.14,641.2
  region net 3.3V: 880.3,660.2 860.61,660.2 860.61,641.2 880.3,641.2
  rectangle net SCL: 910.45,697.2 930.14,761.3
  rectangle net SDA: 860.61,697.2 880.3,761.3
  region net 4IN: 712.27,141.87 712.27,122.19 767.38,122.19 767.38,141.87
  region net 3IN: 712.27,191.87 712.27,172.19 767.38,172.19 767.38,191.87
  region net 2IN: 712.27,241.87 712.27,222.19 767.38,222.19 767.38,241.87
  region net 1IN: 712.27,291.87 712.27,272.19 767.38,272.19 767.38,291.87
  region net GND: 718.27,-77.81 718.27,-58.13 663.15,-58.13 663.15,-77.81
  rectangle net GND: 992.44,-40.29 1012.13,-16.67
  rectangle net VIN5V: 929.27,-75.72 1012.13,-59.98
  region net GND: 383.44,730.26 363.76,730.26 363.76,706.64 383.44,706.64
  region net VIN5V: 333.6,730.26 313.91,730.26 313.91,706.64 333.6,706.64
  region net 3.3V: 174.64,732.22 154.95,732.22 154.95,708.6 174.64,708.6
  region net 3.3V: 233.44,730.26 213.76,730.26 213.76,706.64 233.44,706.64
  region net GND: 283.58,730.26 263.9,730.26 263.9,706.64 283.58,706.64
  rectangle net GND: 155.21,826.25 174.89,849.87
  rectangle net NetC15_1: 154.95,749.94 235.41,808.53
  rectangle net NetC15_1: 213.76,755.85 233.44,817.23
  rectangle net NetC28_1: 263.9,757.81 283.58,819.2
  rectangle net NetR2_1: 313.91,755.85 333.6,817.23
  rectangle net NetC16_1: 363.76,757.81 383.44,819.2
  region net GND: -56.88,1189.16 -80.56,1189.16 -80.56,1156.91 -56.88,1156.91
  rectangle net 3.3V: -96.22,1226.57 61.75,1363.34
  rectangle net GND: 213.76,1031.8 233.44,1074.05
  rectangle net NetC27_2: 211.79,1102.64 285.24,1291.61
  rectangle net NetC27_2: 348.79,1138.15 383.18,1291.61
  rectangle net NetC27_2: 215.29,1182.4 383.18,1291.61
  rectangle net NetC27_2: 261.96,1031.8 285.24,1291.61
  rectangle net GND: 313.76,1138.15 333.44,1161.77
  rectangle net VIN5V: 311.79,1031.8 335.41,1118.47
  rectangle net NetC27_1: 361.79,1031.8 385.41,1118.46
  rectangle net GND: 546.37,116 558.18,156.95
  rectangle net GND: 292.11,109.23 307.21,151.89
  pour cut-out: -11.6,539.83 -105.6,539.83 -105.6,653.83 -11.6,653.83 -11.6,538.83
Bottom Layer:
  text "20240412-V1.2" at 1158.6,870.14 h60 r270

## Silkscreen, mask and mechanical layers (free items; w line width, h text height)
Top Overlay:
  circle w15: c1156.09,1608.58 r79.68
  circle w15: c-0.21,-0.01 r79.68
  circle w15: c0.39,1609.09 r79.68
  circle w15: c1156.09,-0.12 r79.68
  lines w30: -134.51,1681.49 cw(c-92.21,1684.49) -95.21,1726.79 1231.89,1726.77 ; -134.21,-83.02 -134.21,1679.18 ; -134.21,-78.84 ccw(c-91.91,-75.84) -88.91,-118.14 1236.19,-118.12 ; 1228.64,1726.59 cw(c1231.64,1684.29) 1273.94,1687.29 ; 1234.44,-118.12 ccw(c1231.44,-75.82) 1273.74,-72.82 ; 1273.84,-72.82 1273.84,1685.57
  text "3.3V" at 195.98,430.32 h40
  text "TRIG" at 290.89,430.13 h40
  text "ECH" at 397.05,430.15 h40
  text "GND" at 494.13,430.13 h40
Bottom Overlay:
  drawing of 17 lines, arcs and shapes, not listed
  text "S" at 717.94,1289.69 h60 r270
  text "N" at 717.94,1188.33 h60 r270
  text "O" at 717.94,1066.97 h60 r270
  text "I" at 717.94,995.61 h60 r270
  text "T" at 717.94,894.25 h60 r270
  text "U" at 717.94,792.89 h60 r270
  text "L" at 717.94,691.53 h60 r270
  text "1C" at 1246,589.54 h45
  text "O" at 717.94,580.17 h60 r270
  text "2C" at 1241.2,496.92 h45
  text "S" at 717.94,468.8 h60 r270
  text "3C" at 1240.9,395.77 h45
  text "4C" at 1246.98,289.15 h45
  text "5V" at 1246,188.5 h45
Dimensions:
  drawing of 295 lines, arcs and shapes, not listed
  text "Layer" at -439.42,4615 h60
  text "Name" at -29.51,4615 h60
  text "Material" at 900.23,4615 h60
  text "Thickness" at 1760,4615 h60
  text "Constant" at 2409.84,4615 h60
  text "Board Layer Stack" at 2979.7,4615 h60
  text "Top Overlay" at -29.51,4495 h60
  text "Top Solder" at -29.51,4375 h60
  text "Solder Resist" at 900.23,4375 h60
  text "0.010mm" at 1760,4375 h60
  text "3.5" at 2409.84,4375 h60
  text "1" at -439.42,4255 h60
  text "Top Layer" at -29.51,4255 h60
  text "0.036mm" at 1760,4255 h60
  text "Dielectric 1" at -29.51,4135 h60
  text "FR-4" at 900.23,4135 h60
  text "0.254mm" at 1760,4135 h60
  text "4.2" at 2409.84,4135 h60
  text "2" at -439.42,4015 h60
  text "GND" at -29.51,4015 h60
  text "0.036mm" at 1760,4015 h60
  text "Dielectric 3" at -29.51,3895 h60
  text "0.127mm" at 1760,3895 h60
  text "4.2" at 2409.84,3895 h60
  text "3" at -439.42,3775 h60